# Altium PCB PCI Express_16765X6890_64PIN_Low profile_Clear.PCBDOC (part 1 of 9)
Units mm, origin at the board's own origin, x right, y up, seen from the top; angles counter-clockwise.
Board outline 80.71 x 137.84 mm, 6 copper layers (Top Layer, Layer 2 (GND), Layer 3, Layer 4, Layer 5 (AGND), Bottom Layer), stack 1.571 mm thick; 507 components, 297 nets, 1544 pads, 616 vias.
Unrouted connection lines stored in the file: 101.
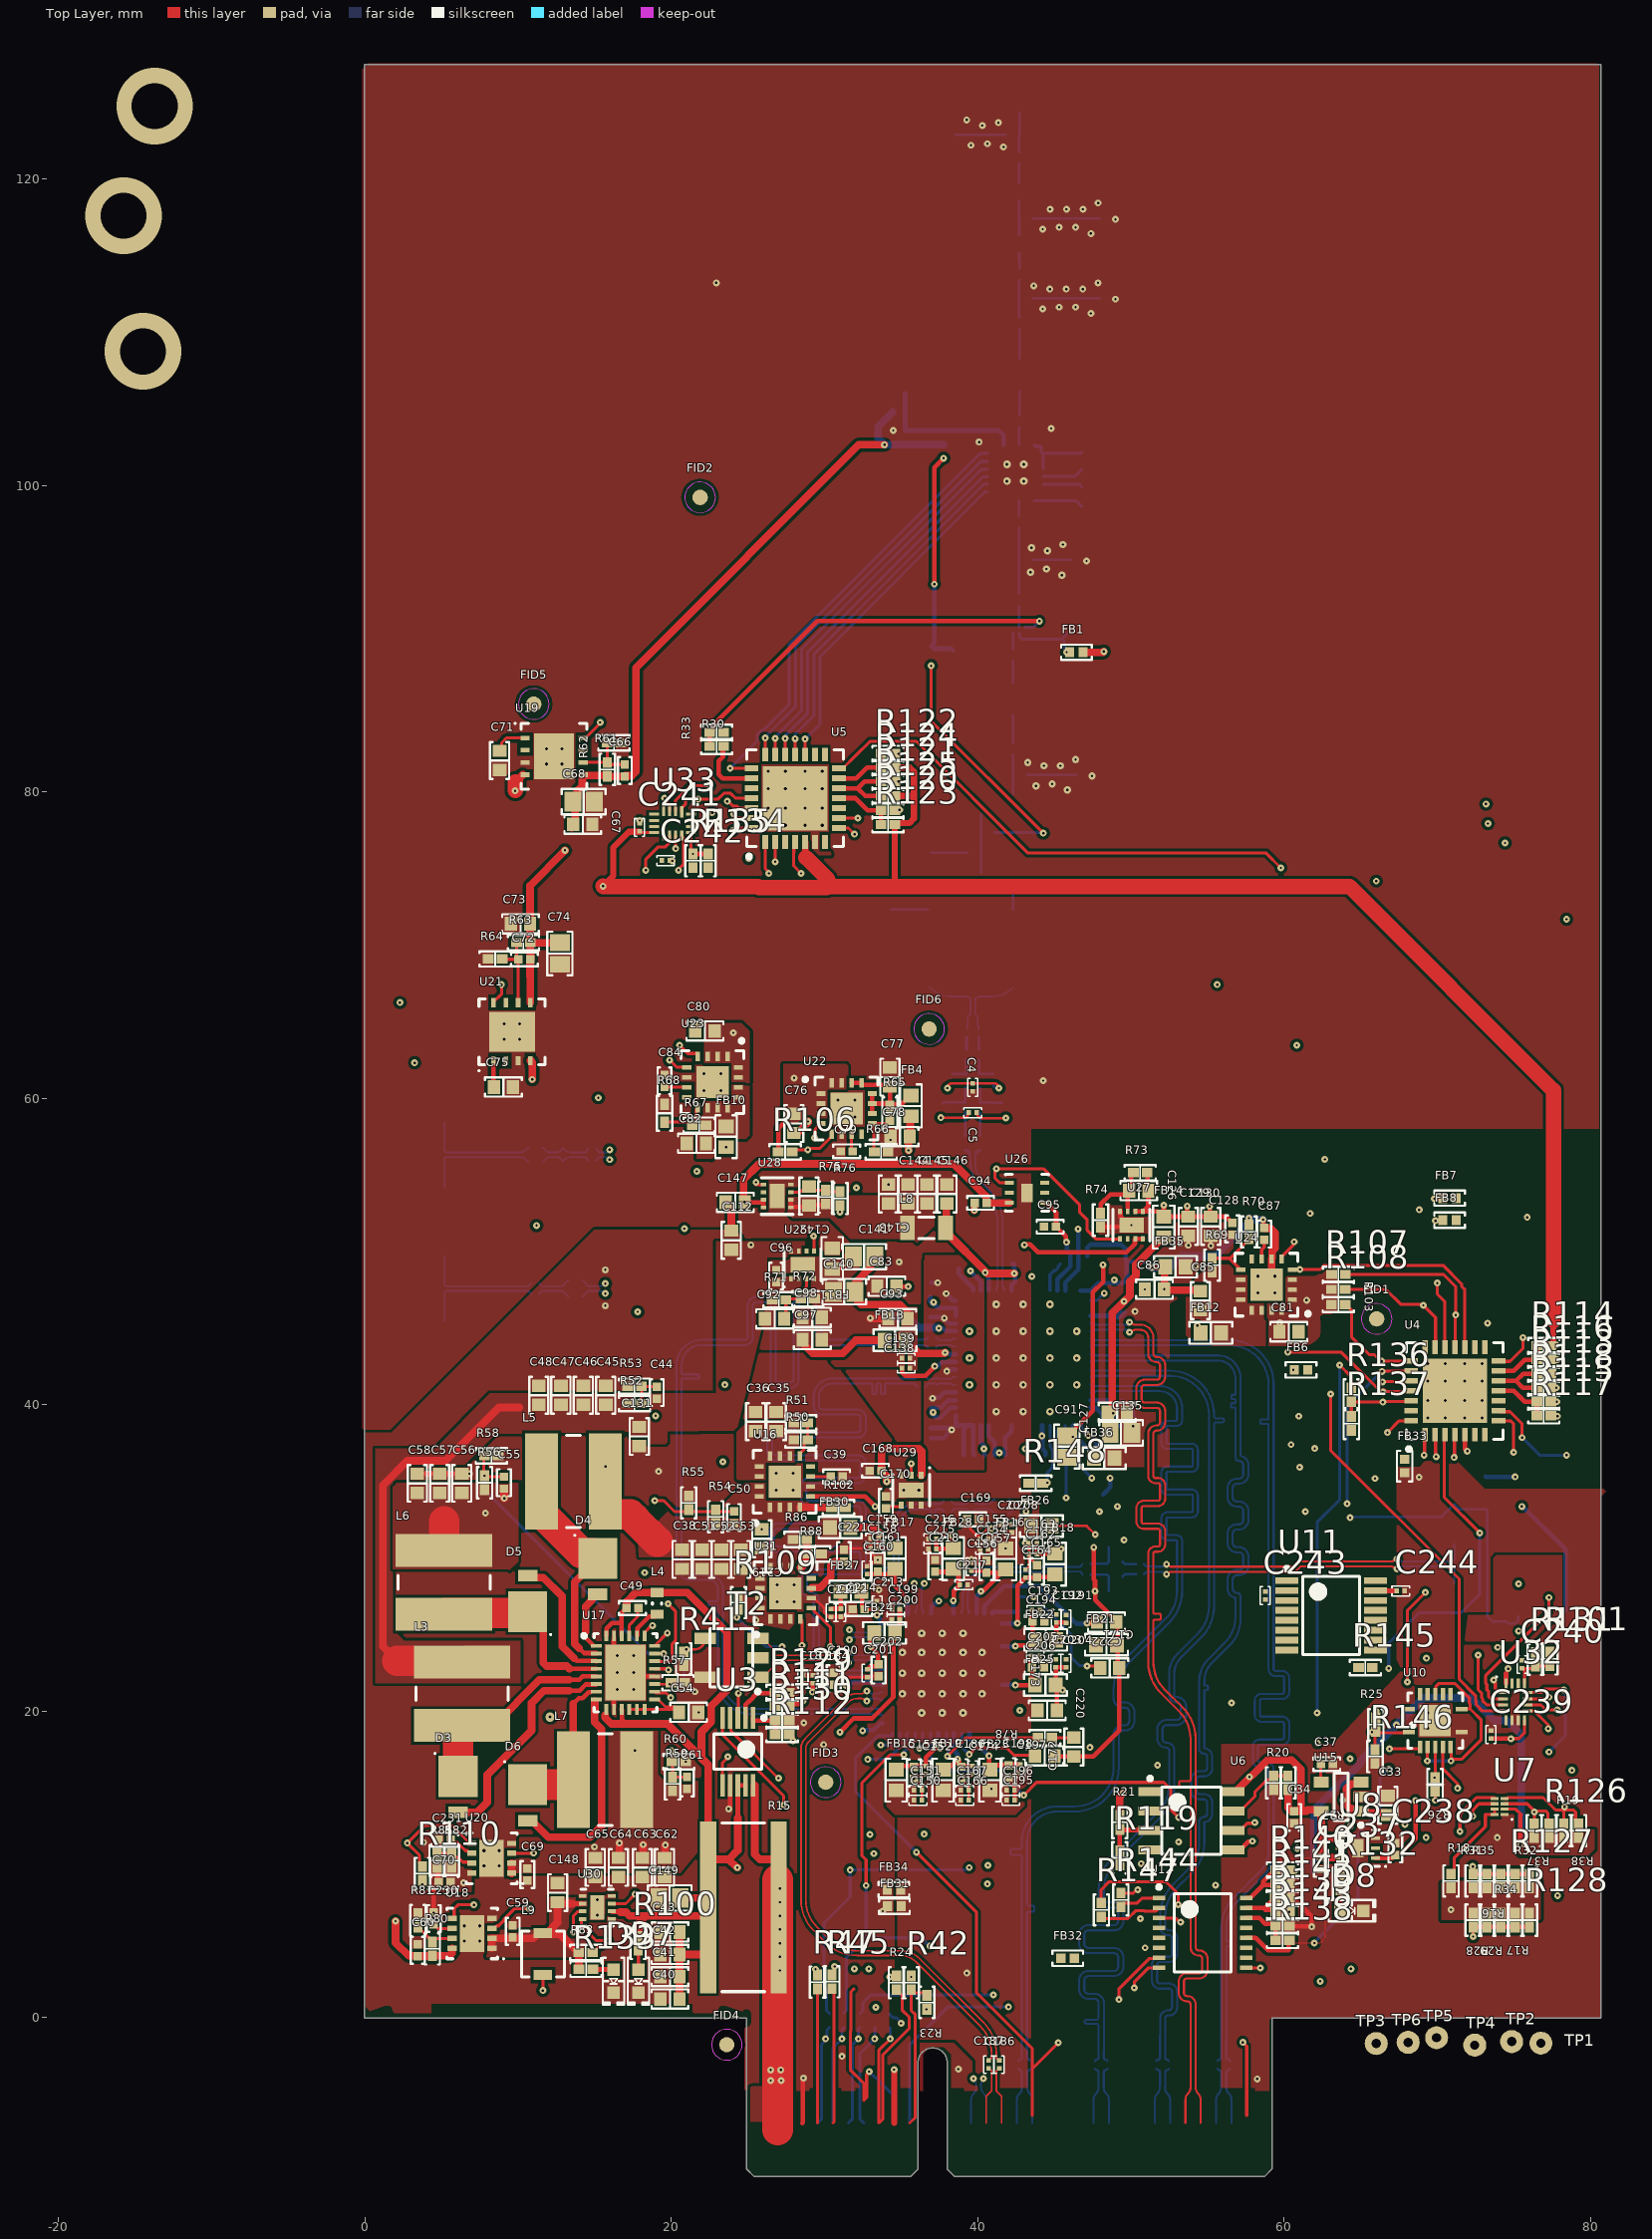
[diagram p0: Top Layer view]
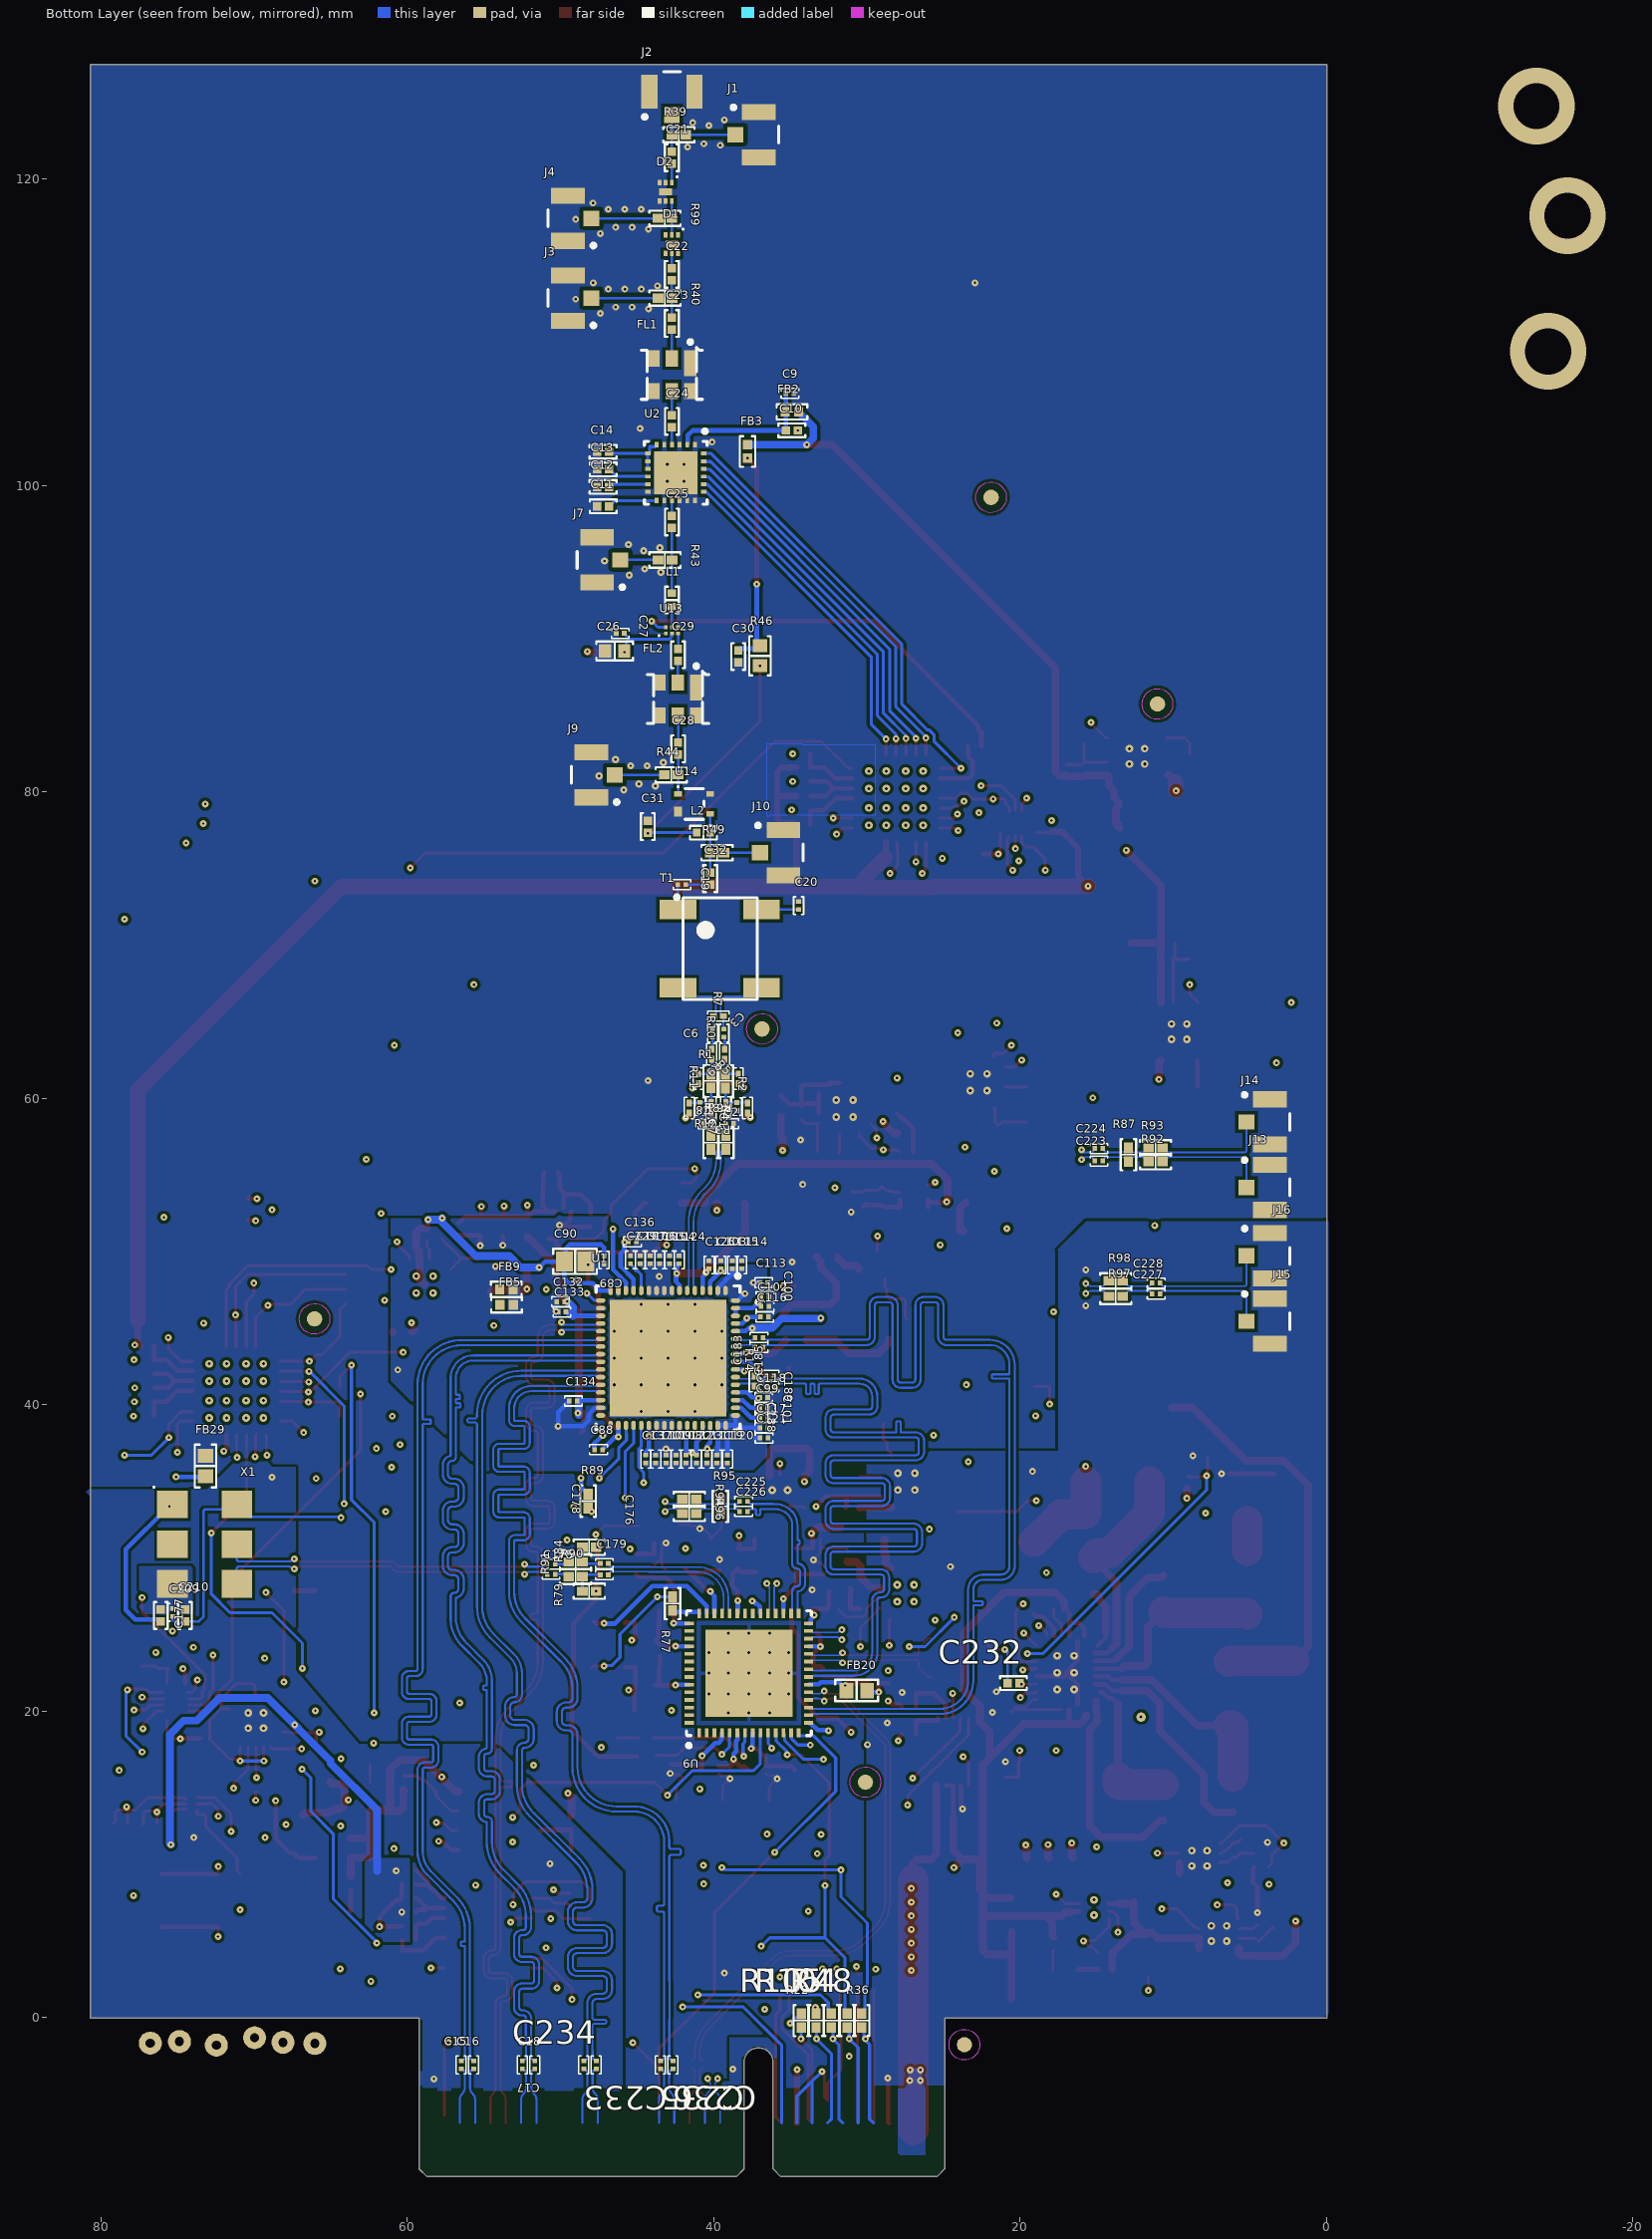
[diagram p1: Bottom Layer view, seen from below]
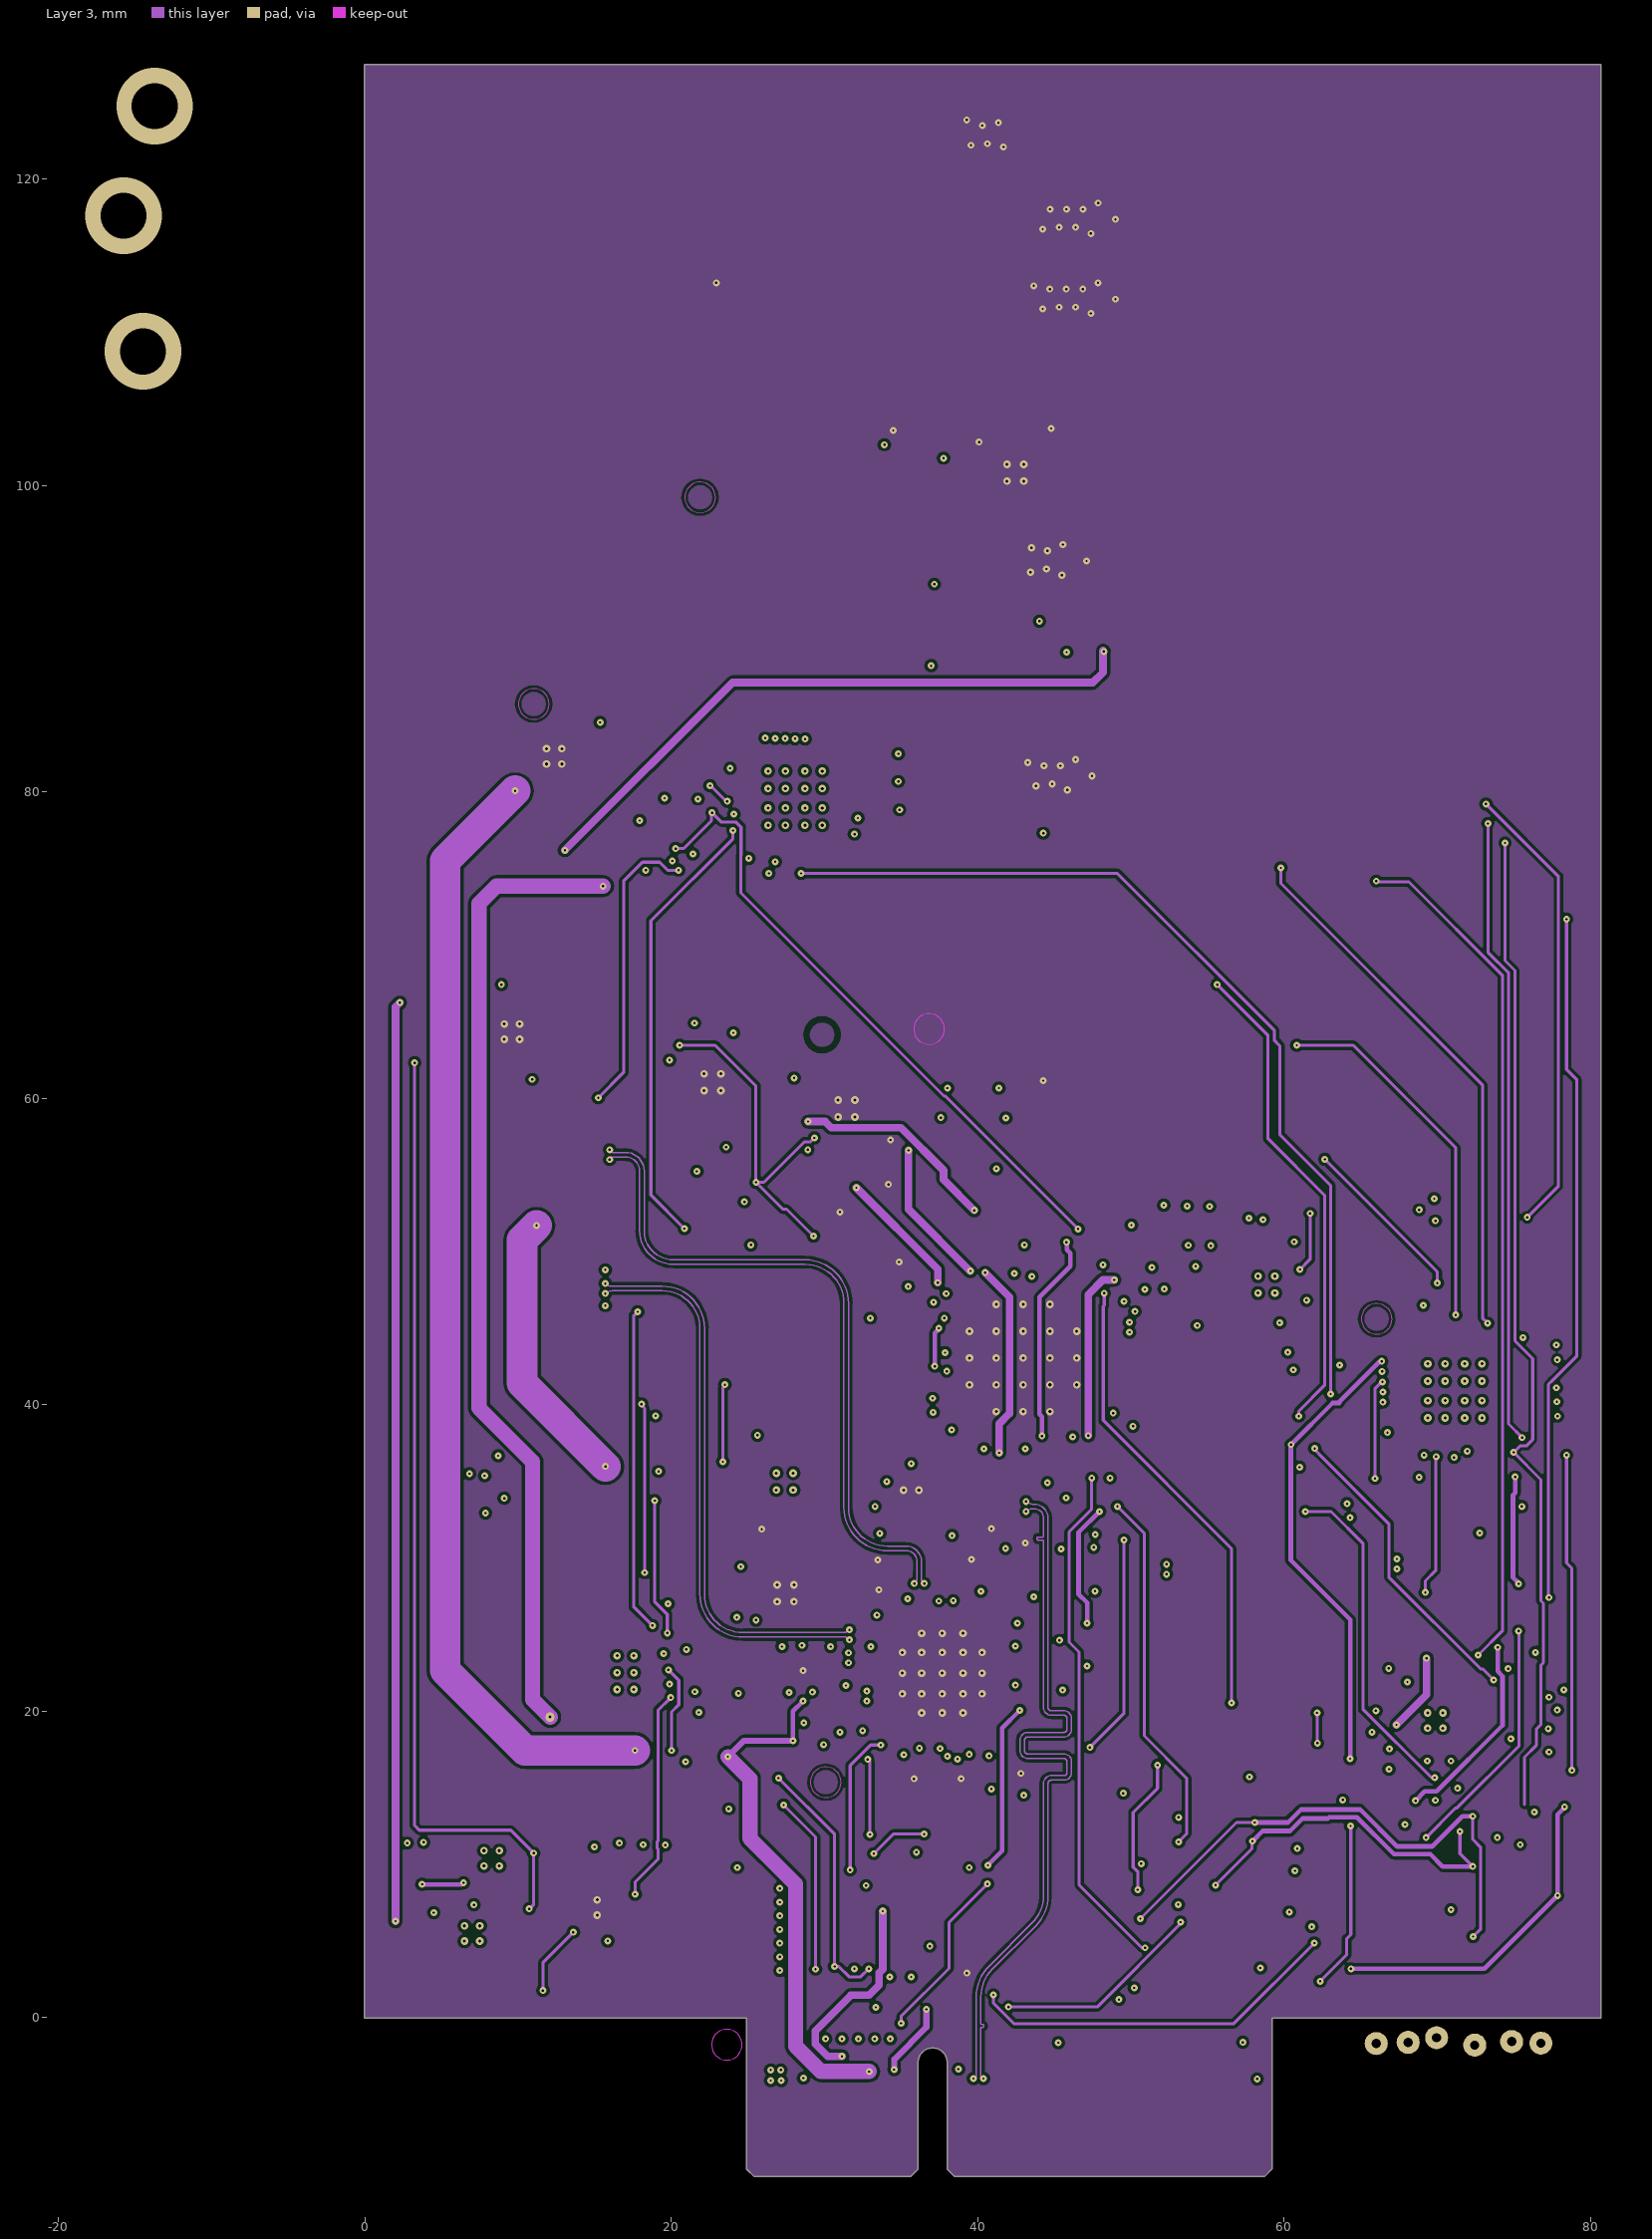
[diagram p2: Layer 3]
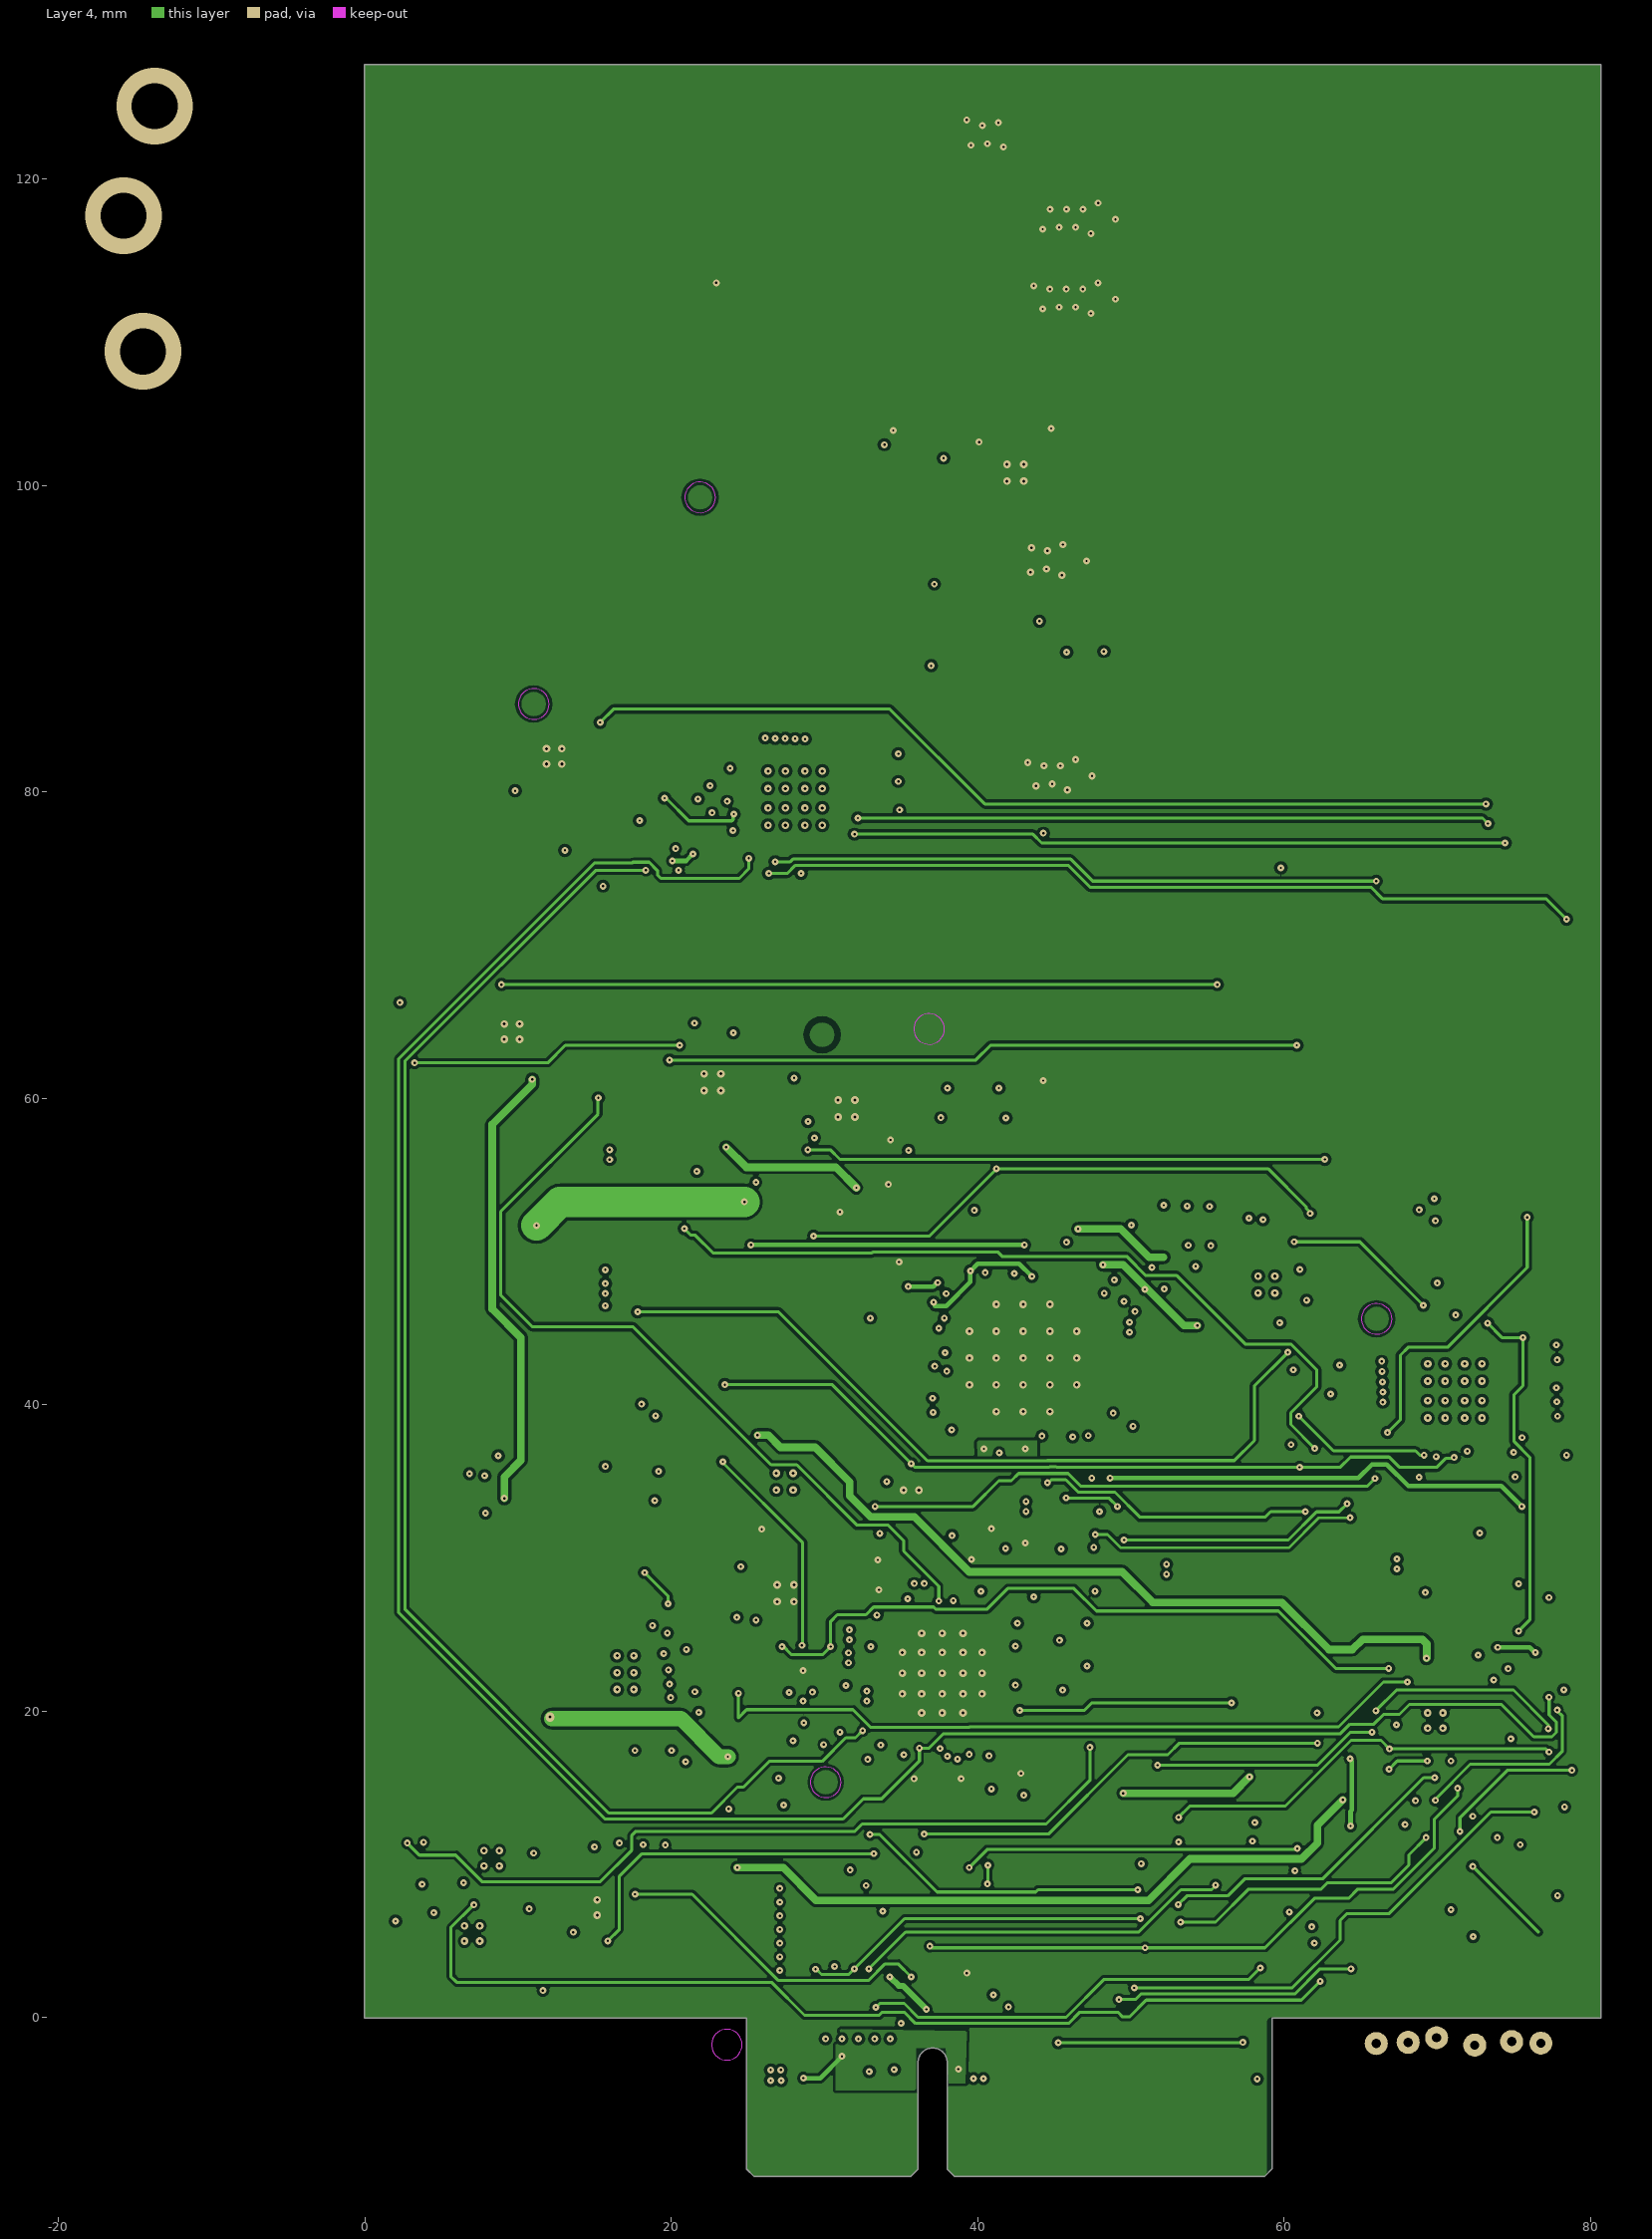
[diagram p3: Layer 4]

## Layer stack, top to bottom
Top Solder: solder mask 0.02, SM-001, Dk 4
Top Layer: signal copper 0.018
Dielectric 1: prepreg 0.105, PP-016, Dk 4.4
Layer 2 (GND): signal copper 0.035
Dielectric 3: core 0.5, Core-035, Dk 4.7
Layer 3: signal copper 0.035
Dielectric 5: prepreg 0.185, PP-021, Dk 4.7
Layer 4: signal copper 0.035
Dielectric 6: core 0.5, Core-035, Dk 4.7
Layer 5 (AGND): signal copper 0.035
Dielectric 7: prepreg 0.105, PP-016, Dk 4.4
Bottom Layer: signal copper 0.018
Bottom Solder: solder mask 0.02, SM-001, Dk 4

## Board outline
-0.039,-0.051 24.909,-0.051 24.909,-9.888 25.409,-10.388 35.609,-10.388 36.109,-9.888 36.109,-2.938 cw(c37.059,-2.938) 38.009,-2.938 38.009,-9.888 38.509,-10.388 58.709,-10.388 59.209,-9.888 59.209,-0.051 80.674,-0.051 80.674,127.457 -0.039,127.457

## Design rules (kind name [scope] priority, off if disabled: settings)
Clearance Diif100 [InNetClass('Diff100')] p1: gap=0.2 ignorepadtopadclearanceinfootprint=FALSE
Clearance 50Ohm [InNetClass('Single50Ohm')] p2: gap=0.2 ignorepadtopadclearanceinfootprint=FALSE
Clearance [All] p3: gap=0.2 ignorepadtopadclearanceinfootprint=FALSE
DiffPairsRouting [InDifferentialPairClass('All Differential Pairs')] p1: maxlimit=0.2 minlimit=0.127 mostfreqgap=0.2 toplayer_minwidth=0.112 toplayer_maxwidth=0.141 toplayer_prefwidth=0.141 midlayer1_mingap=0.127 midlayer1_minwidth=0.055 midlayer1_maxwidth=0.101 midlayer1_prefwidth=0.101 midlayer2_mingap=0.127 midlayer2_minwidth=0.055 midlayer2_maxwidth=0.101 midlayer2_prefwidth=0.101 midlayer3_maxgap=0.127 midlayer3_prefgap=0.127 midlayer3_minwidth=0.043 midlayer3_maxwidth=0.048 midlayer3_prefwidth=0.048 midlayer4_maxgap=0.127 midlayer4_prefgap=0.127 midlayer4_minwidth=0.043 midlayer4_maxwidth=0.048 midlayer4_prefwidth=0.048 bottomlayer_minwidth=0.112 bottomlayer_maxwidth=0.141 bottomlayer_prefwidth=0.141 impedanceprofiledriven=TRUE impedanceprofileid={1AC89F91-10E0-4EB5-B110-80BDDA22771A} impedanceprofilevalue=100.000000 maxuncoupledlength=20
Length Length_4 [InNetClass('Dlugosc4')] p1: maxlimit=68.6 minlimit=68
Length Length_3 [InNetClass('Dlugosc_sync')] p2: maxlimit=68 minlimit=67.5
Length Length_2 [InNetClass('Dlugosc_2')] p3: maxlimit=10.5 minlimit=10
Length Length_1 [InNetClass('Dlugosc_1')] p4: maxlimit=54.5 minlimit=54
Length [InNetClass('Dlugosc')] p5: maxlimit=66 minlimit=65.5
MatchedLengths MatchedLengths_1 [InNetClass('Dlugosc')] p1: tolerance=0.5 checknetsindiffpair=TRUE checkdiffpairvsdiffpair=FALSE checkxsignals=FALSE checkothers=FALSE
PlaneConnect [All] p1: planeconnectstyle=Direct reliefexpansion=0.508 reliefentries=4 reliefconductorwidth=0.254 reliefairgap=0.254
PolygonConnect [All] p1: connectstyle=Direct reliefconductorwidth=0.254 reliefentries=4 polygonreliefangle="90 Angle" airgapwidth=0.254
RoutingVias [All] p1: holewidth=0.2 width=0.6 viastyle="Through Hole" minholewidth=0.15 minwidth=0.4 maxholewidth=0.5 maxwidth=1
SolderMaskExpansion [All] p1: expansion=0.102 istentingtop=FALSE
Width 50_100 [InNetClass('Single50Ohm') or InNetClass('Diff100')] p1: maxlimit=0.181 minlimit=0.102 preferedwidth=0.181 toplayer_minwidth=0.165 toplayer_maxwidth=0.169 toplayer_prefwidth=0.169 midlayer1_minwidth=0.174 midlayer2_minwidth=0.174 midlayer3_maxwidth=0.107 midlayer3_prefwidth=0.107 midlayer4_maxwidth=0.107 midlayer4_prefwidth=0.107 bottomlayer_minwidth=0.165 bottomlayer_maxwidth=0.169 bottomlayer_prefwidth=0.169 impedanceprofiledriven=TRUE impedanceprofileid={0EED1AA9-C798-4E79-A537-DC2102893D86} impedanceprofilevalue=50.000000 minimp=50.000000 maximp=50.000000 favimp=50.000000
Width Power [InNetClass('Power_LINE')] p2: maxlimit=2 minlimit=0.3 preferedwidth=0.5
Width Inn [InNetClass('All Nets')] p3: maxlimit=0.4 minlimit=0.2 preferedwidth=0.3
28 further rules are at their usual default settings.

## Classes and differential pairs
net class Dlugosc4: CLKout1_N CLKout1_P CLKout2_P
net class Dlugosc_3: CLKout2_N CLKout3_N CLKout3_P
net class Dlugosc_sync: PET3_N PET3_P
net class Dlugosc_2: LMK_CLKin1_N LMK_CLKin1_P
net class Dlugosc_1: CLKin1_N CLKin1_P
net class Dlugosc: CMLout1_N CMLout1_P CMLout2_N CMLout2_P CMLout3_N CMLout3_P CMLout4_N CMLout4_P NetU1_20 NetU1_21
net class CLK_IN2: LMK_CLKin0_N LMK_CLKin0_P LMK_CLKin1_N LMK_CLKin1_P
differential pair class Diff100: ADC_CLK9690 AN_IN AN_IN_9690 CLKin0 CLKin0_1 CLKin1 CLKin1_1 CLKout1 CLKout2 CLKout3 CLKout4 CLKout5 CLKout9 LMK_CLKin0 LMK_CLKin1 O1 O2 O5 O5P OSCIN VCXO_OUT
differential pair class Diff100CtoConn: O2 PER0 PER1 PER2 PER3 PET1 PET2 PET3
differential pair class Diff100ADCtoC: CMLout1 CMLout2 CMLout3 CMLout4
net class Single50Ohm: AGND AN_IN_N AN_IN_P CLKin0_1_N CLKin0_1_P CLKin0_N CLKin0_P CLKin1_1_N CLKin1_1_P LMK_CLKin0_N LMK_CLKin0_P LMK_CLKin1_N LMK_CLKin1_P NetC1_1 NetC2_1 NetC3_2 NetC4_2 NetC5_1 NetC5_2 NetC6_2 NetC7_2 NetC8_2 NetC21_1 NetC21_2 NetC22_1 NetC22_2 NetC23_2 NetC24_1 NetC24_2 NetC25_1 NetC25_2 NetC28_1 NetC28_2 NetC29_1 NetC29_2 NetC32_2 NetC175_2 NetC176_1 NetC178_2 NetC179_1 NetC209_2 NetC232_1 NetC232_2 NetD1_2 NetJ1_2 NetJ3_2 NetJ4_2 NetJ7_2 NetJ9_2 NetJ10_2 NetL1_1 NetR1_2 NetR9_1 Tor_RF_50 TorRF_50 TorRF_50_1 VCXO_OUT_N VCXO_OUT_P
net class Power_LINE: 1.8V_SPI_ADC 5V 12V 4610_FINE_V 9690_AGND_SR +12V AGND AVDD1_1.25V AVDD1_SR_1.25V AVDD2_2.5V AVDD3_3.3V CLK_GND CTRL_VCXO DGND DRGND DRVDD_1.25V DVDD_1.25V GND GND_VCXO NetC66_2 NetC72_2 NetC77_2 NetC82_2 NetC85_2 NetC92_2 NetC126_2 NetC142_2 NetC177_2 NetC209_2 NetC219_2 NetD3_1 NetD3_2 NetD4_1 NetD4_2 NetD5_1 NetD5_2 NetD6_1 NetD6_2 "NetU1_44, 43, 32" V2.5 V3.6 V5.5 V_LMK_1.8V VCC VCC_5_ATT VCC_AMP_5 VCC_PCA VDD_CORE VDD_IO VDD_OSC VDD_PLL1 VDD_PLL2CORE VDD_PLL2OSC VDDO_1/2 VDDO_3/4 VDDO_5 VDDO_6 VDDO_7/8 VDDO_9/10 VP3.6 Vsup_ADC1 Vsup_ADC2
net class JTAG[1..5]: JTAG1 JTAG2 JTAG3 JTAG4 JTAG5
net class Diff100: ADC_CLK9690_N ADC_CLK9690_P AGND AN_IN_9690_N AN_IN_9690_P AN_IN_N AN_IN_P CLKin0_N CLKin0_P CLKin1_N CLKin1_P CLKout1_N CLKout1_P CLKout2_N CLKout2_P CLKout3_N CLKout3_P CLKout4_N CLKout4_P CLKout5_N CLKout5_P LMK_CLKin0_N LMK_CLKin0_P LMK_CLKin1_N LMK_CLKin1_P LMK_CLKsel NetC209_2 O1_N O1_P O2_N O2_P O5_N O5_P O5P_N O5P_P OSCIN_N OSCIN_P VCXO_OUT_N VCXO_OUT_P
net class CtoConn: O2_N O2_P PER0_N PER0_P PER1_N PER1_P PER2_N PER2_P PER3_N PER3_P PET1_N PET1_P PET2_N PET2_P PET3_N PET3_P
net class CLKDisToC: CLKout1_N CLKout1_P CLKout2_N CLKout2_P CLKout3_N CLKout3_P CLKout5_N CLKout5_P
net class CLK_Out: CLKout1_N CLKout1_P CLKout2_N CLKout2_P CLKout3_N CLKout3_P CLKout5_N CLKout5_P
net class CLK_O: ADC_CLK9690_N ADC_CLK9690_P O1_N O1_P O2_N O2_P O5_N O5_P
net class CLK_IN1: CLKin0_N CLKin0_P CLKin1_N CLKin1_P
net class Ain: AN_IN_9690_N AN_IN_9690_P
net class ADC_CLK: ADC_CLK9690_N ADC_CLK9690_P O1_N O1_P O2_N O2_P O5_N O5_P
component class U_Zegar: C171 C172 C173 C175 C176 C177 C178 C179 C183 C185 C186 C187 C188 C189 C222 C223 C224 C225 C226 C227 C228 C232 FB21 J13 J14 J15 J16 R41 R77 R78 R79 R84 R87 R89 R90 R91 R92 R93 R94 R95 R96 R97 R98 T2 X1
component class U_Zasilanie: C33 C34 C35 C36 C37 C38 C39 C40 C41 C42 C43 C44 C45 C46 C47 C48 C49 C50 C51 C52 C53 C54 C55 C56 C57 C58 C59 C60 C61 C62 C63 C64 C65 C66 C67 C68 C69 C70 C71 C72 C73 C74 C75 C148 C149 C230 C231 C237 C238 D3 D4 D5 D6 D7 D8 D9 FB31 FB32 FB33 FB34 L3 L4 L5 L6 L7 L9 R50 R51 R52 R53 R54 R55 R56 R57 R58 R59 R60 R61 R62 R63 R64 R80 R81 R82 R83 R85 R100 R102 R103 R110 R132 R133 U8 U15 U16 U17 U18 U19 U20 U21 U30
component class U_Zasilanie_LMK: C150 C151 C152 C153 C154 C155 C156 C157 C158 C159 C160 C161 C162 C163 C164 C165 C166 C167 C168 C169 C170 C174 C180 C181 C182 C184 C190 C191 C192 C193 C194 C195 C196 C197 C198 C199 C200 C201 C202 C203 C204 C205 C206 C207 C208 C209 C210 C211 C212 C213 C214 C215 C216 C217 C218 C219 C220 C221 FB15 FB16 FB17 FB18 FB19 FB20 FB22 FB23 FB24 FB25 FB26 FB27 FB28 FB29 FB30 R86 R88 R109 U9 U29 U31
component class U_Zasilanie_ADC: C76 C77 C78 C79 C80 C81 C82 C83 C84 C85 C86 C87 C88 C89 C90 C91 C92 C93 C94 C95 C96 C97 C98 C99 C100 C101 C102 C103 C104 C105 C106 C107 C108 C109 C110 C111 C112 C113 C114 C115 C116 C117 C118 C119 C120 C121 C122 C123 C124 C125 C126 C127 C128 C129 C130 C131 C132 C133 C134 C135 C136 C137 C138 C139 C140 C141 C142 C143 C144 C145 C146 C147 C229 FB4 FB5 FB6 FB7 FB8 FB9 FB10 FB11 FB12 FB13 FB14 FB35 FB36 L8 R65 R66 R67 R68 R69 R70 R71 R72 R73 R74 R75 R76 R106 R107 R108 U1 U22 U23 U24 U25 U26 U27 U28
component class U_Tor: C19 C20 FB1 FB2 FB3 T1
component class U_TorGnss: C23 C24 C25 C26 C27 C28 C29 C30 C31 C32 FL1 FL2 J7 J9 J10 L1 L2 R43 R44 R46 R49 U13 U14
component class "U_Tor antenowy": C21 C22 D1 D2 J1 J2 J3 J4 R39 R40 R99
component class "U_Pomiar prądu i napięcia": R15 R111 R112 R129 R130 U3
component class U_Komunikacja: C15 C16 C17 C18 C233 C234 C235 C236 C243 C244 R16 R17 R18 R19 R22 R23 R24 R25 R26 R28 R29 R31 R32 R34 R35 R36 R37 R38 R42 R45 R47 R48 R104 R105 R126 R127 R128 R138 R139 R140 R141 R142 R143 R144 R145 R146 R147 R148 TP1 TP2 TP3 TP4 TP5 TP6 U7 U10 U11 U12
component class U_Flash: R20 R21 R27 R119 U6
component class U_Expander: C239 C240 C241 C242 R30 R33 R101 R113 R114 R115 R116 R117 R118 R120 R121 R122 R123 R124 R125 R131 R134 R135 R136 R137 U4 U5 U32 U33
component class U_ATT: C9 C10 C11 C12 C13 C14 U2
component class U_ADC: C1 C2 C3 C4 C5 C6 C7 C8 R1 R2 R3 R4 R5 R6 R7 R8 R9 R10 R11 R12 R13 R14
component class Karta_Radiowa: FID1 FID2 FID3 FID4 FID5 FID6
differential pair PET2: +PET2_P -PET2_N
differential pair PET1: +PET1_P -PET1_N
differential pair CMLout4: +CMLout4_P -CMLout4_N
differential pair CMLout3: +CMLout3_P -CMLout3_N
differential pair OSCIN: +OSCIN_P -OSCIN_N
differential pair CLKout4: +CLKout4_P -CLKout4_N
differential pair CLKin0: +CLKin0_P -CLKin0_N
differential pair CLKin1_1: +CLKin1_1_P -CLKin1_1_N
differential pair CLKin0_1: +CLKin0_1_P -CLKin0_1_N
differential pair VCXO_OUT: +VCXO_OUT_P -VCXO_OUT_N
differential pair PET3: +PET3_P -PET3_N
differential pair PER3: +PER3_P -PER3_N
differential pair PER2: +PER2_P -PER2_N
differential pair PER1: +PER1_P -PER1_N
differential pair PER0: +PER0_P -PER0_N
differential pair O5: +O5_P -O5_N
differential pair O5P: +O5P_P -O5P_N
differential pair O2: +O2_P -O2_N
differential pair O1: +O1_P -O1_N
differential pair LMK_CLKin1: +LMK_CLKin1_P -LMK_CLKin1_N
differential pair LMK_CLKin0: +LMK_CLKin0_P -LMK_CLKin0_N
differential pair CMLout2: +CMLout2_P -CMLout2_N
differential pair CMLout1: +CMLout1_P -CMLout1_N
differential pair CLKout5: +CLKout5_P -CLKout5_N
differential pair CLKout3: +CLKout3_P -CLKout3_N
differential pair CLKout2: +CLKout2_P -CLKout2_N
differential pair CLKout1: +CLKout1_P -CLKout1_N
differential pair CLKin1: +CLKin1_P -CLKin1_N
differential pair AN_IN: +AN_IN_P -AN_IN_N
differential pair AN_IN_9690: +AN_IN_9690_P -AN_IN_9690_N
differential pair ADC_CLK9690: +ADC_CLK9690_P -ADC_CLK9690_N

## Components (designator, comment, footprint, x,y, rotation, side; value= is the part's Value field where it differs from the comment)
C1 "4pF" "CAP 0201/0603 RF" 38.481,59.455 r270 bottom
C2 "1pF" "CAP 0201/0603 RF" 38.938,58.344 r180 bottom
C3 "100nF" "CAP 0201/0603 RF" 39.319,64.243 r270 bottom
C4 "100nF" "CAP 0201/0603 RF" 39.675,60.706 r90 top
C5 "1pF" "CAP 0201/0603 RF" 39.675,59.055 r180 top
C6 "100nF" "CAP 0201/0603 RF" 40.056,64.243 r270 bottom
C7 "4pF" "CAP 0201/0603 RF" 40.869,59.461 r90 bottom
C8 "1pF" "CAP 0201/0603 RF" 40.411,58.344 r180 bottom
C9 "100nF" "CAP 0201/0603 RF" 35.005,106.006 r0 bottom
C10 "10uF" "CAP 0402/1005 RF" 34.877,103.581 r0 bottom
C11 "330pF" "CAP 0402/1005 RF" 47.196,98.628 r0 bottom
C12 "330pF" "CAP 0402/1005 RF" 47.205,99.898 r0 bottom
C13 "330pF" "CAP 0402/1005 RF" 47.196,101.041 r0 bottom
C14 "330pF" "CAP 0402/1005 RF" 47.205,102.184 r0 bottom
C15 "100nF" "CAP 0201/0603 RF" 56.464,-3.093 r270 bottom
C16 "100nF" "CAP 0201/0603 RF" 55.651,-3.093 r270 bottom
C17 "100nF" "CAP 0201/0603 RF" 52.476,-3.099 r270 bottom
C18 "100nF" "CAP 0201/0603 RF" 51.664,-3.099 r270 bottom
C19 "100nF" "CAP 0201/0603 RF" 42.057,73.941 r0 bottom
C20 "100nF" "CAP 0201/0603 RF" 34.442,72.568 r270 bottom
C21 "22pF" "CAP 0402/1005 RF" 42.716,121.386 r270 bottom
C22 "22pF" "CAP 0402/1005 RF" 42.717,113.763 r270 bottom
C23 "33pF" "CAP 0402/1005 RF" 42.717,110.566 r270 bottom
C24 "33pF" "CAP 0402/1005 RF" 42.709,104.169 r270 bottom
C25 "33pF" "CAP 0402/1005 RF" 42.709,97.603 r270 bottom
C26 "2.2uF" "CAP 0603/1608 RF" 46.446,89.19 r180 bottom
C27 "100nF" "CAP 0201/0603 RF" 46.087,90.331 r180 bottom
C28 "33pF" "CAP 0402/1005 RF" 42.309,82.802 r90 bottom
C29 "33pF" "CAP 0402/1005 RF" 42.317,88.942 r90 bottom
C30 "33pF" "CAP 0402/1005 RF" 38.382,88.824 r90 bottom
C31 "33pF" "CAP 0402/1005 RF" 44.284,77.725 r270 bottom
C32 "33pF" "CAP 0402/1005 RF" 40.217,74.331 r90 bottom
C33 "1uF" "CAP 0603/1608 RF" 66.777,13.843 r270 top
C34 "2.2uF" "CAP 0402/1005 RF" 60.655,13.056 r90 top
C35 "4.7uF" "CAP 0603/1608 RF" 26.848,38.887 r270 top
C36 "4.7uF" "CAP 0603/1608 RF" 25.502,38.887 r270 top
C37 "100pF" "CAP 0402/1005 RF" 62.788,16.539 r180 top
C38 "4.7uF" "CAP 0603/1608 RF" 20.707,29.897 r90 top
C39 "1nF" "CAP 0402/1005 RF" 30.785,35.306 r180 top
C40 "4.7uF" "CAP 0603/1608 RF" 19.914,1.201 r180 top
C41 "4.7uF" "CAP 0603/1608 RF" 19.914,2.658 r180 top
C42 "4.7uF" "CAP 0603/1608 RF" 19.914,4.111 r180 top
C43 "4.7uF" "CAP 0603/1608 RF" 19.914,5.573 r180 top
C44 "22pF" "CAP 0402/1005 RF" 19.05,40.783 r270 top
C45 "4.7uF" "CAP 0603/1608 RF" 15.721,40.606 r270 top
C46 "4.7uF" "CAP 0603/1608 RF" 14.256,40.606 r270 top
C47 "4.7uF" "CAP 0603/1608 RF" 12.79,40.606 r270 top
C48 "4.7uF" "CAP 0603/1608 RF" 11.352,40.606 r270 top
C49 "1uF" "CAP 0402/1005 RF" 17.462,26.72 r180 top
C50 "22pF" "CAP 0402/1005 RF" 24.091,32.631 r270 top
C51 "4.7uF" "CAP 0603/1608 RF" 22.022,29.896 r90 top
C52 "4.7uF" "CAP 0603/1608 RF" 23.266,29.896 r90 top
C53 "4.7uF" "CAP 0603/1608 RF" 24.536,29.896 r90 top
C54 "100nF" "CAP 0603/1608 RF" 21.133,19.914 r180 top
C55 "22pF" "CAP 0402/1005 RF" 9.075,34.902 r270 top
C56 "4.7uF" "CAP 0603/1608 RF" 6.323,34.861 r270 top
C57 "4.7uF" "CAP 0603/1608 RF" 4.883,34.861 r270 top
C58 "4.7uF" "CAP 0603/1608 RF" 3.422,34.861 r270 top
C59 "4.7uF" "CAP 0402/1005 RF" 9.65,5.618 r270 top
C60 "4.7uF" "CAP 0402/1005 RF" 3.44,4.386 r270 top
C61 "22pF" "CAP 0402/1005 RF" 21.024,15.3 r270 top
C62 "4.7uF" "CAP 0603/1608 RF" 19.554,9.789 r90 top
C63 "4.7uF" "CAP 0603/1608 RF" 18.114,9.789 r90 top
C64 "4.7uF" "CAP 0603/1608 RF" 16.551,9.789 r90 top
C65 "4.7uF" "CAP 0603/1608 RF" 15.035,9.789 r90 top
C66 "680pF" "CAP 0402/1005 RF" 16.963,81.384 r270 top
C67 "1uF" "CAP 0603/1608 RF" 14.224,77.876 r180 top
C68 "10uF" "CAP 0805/2012 RF" 14.275,79.35 r180 top
C69 "4.7uF" "CAP 0402/1005 RF" 10.605,9.32 r90 top
C70 "4.7uF" "CAP 0402/1005 RF" 5.213,8.851 r0 top
C71 "10nF" "CAP 0603/1608 RF" 8.788,82.042 r90 top
C72 "1.5nF" "CAP 0402/1005 RF" 10.421,69.06 r0 top
C73 "4.7uF" "CAP 0603/1608 RF" 10.161,71.384 r0 top
C74 "10uF" "CAP 0805/2012 RF" 12.725,69.439 r90 top
C75 "10nF" "CAP 0603/1608 RF" 9.042,60.731 r180 top
C76 "4.7uF" "CAP 0603/1608 RF" 28.003,58.349 r90 top
C77 "4.7uF" "CAP 0603/1608 RF" 34.27,61.374 r270 top
C78 "4.7uF" "CAP 0603/1608 RF" 34.937,57.499 r0 top
C79 "1nF" "CAP 0402/1005 RF" 31.454,56.527 r0 top
C80 "4.7uF" "CAP 0603/1608 RF" 22.196,64.383 r0 top
C81 "4.7uF" "CAP 0603/1608 RF" 60.31,44.755 r180 top
C82 "4.7uF" "CAP 0603/1608 RF" 21.64,57.055 r0 top
C83 "4.7uF" "CAP 0603/1608 RF" 34.071,47.727 r0 top
C84 "1nF" "CAP 0402/1005 RF" 19.558,61.138 r270 top
C85 "4.7uF" "CAP 0603/1608 RF" 54.534,46.787 r270 top
C86 "4.7uF" "CAP 0603/1608 RF" 51.537,47.523 r180 top
C87 "1nF" "CAP 0402/1005 RF" 58.699,51.13 r270 top
C88 "100nF" "CAP 0201/0603 RF" 47.498,37.059 r180 bottom
C89 "100nF" "CAP 0201/0603 RF" 47.142,49.434 r270 bottom
C90 "10uF" "CAP 0805/2012 RF" 49.036,49.352 r180 bottom
C91 "10uF" "CAP 0805/2012 RF" 45.822,37.262 r90 top
C92 "2.2nF" "CAP 0603/1608 RF" 26.746,45.593 r180 top
C93 "4.7uF" "CAP 0603/1608 RF" 34.788,45.618 r0 top
C94 "470nF" "CAP 0402/1005 RF" 40.183,53.169 r0 top
C95 "470nF" "CAP 0402/1005 RF" 44.729,51.613 r0 top
C96 "1uF" "CAP 0402/1005 RF" 26.841,48.387 r270 top
C97 "10uF" "CAP 0603/1608 RF" 29.199,44.239 r180 top
C98 "4.7uF" "CAP 0603/1608 RF" 29.199,45.695 r180 top
C99 "100nF" "CAP 0201/0603 RF" 36.722,39.776 r0 bottom
C100 "100nF" "CAP 0201/0603 RF" 36.633,47.041 r0 bottom
C101 "100nF" "CAP 0201/0603 RF" 36.697,39.141 r0 bottom
C102 "100nF" "CAP 0201/0603 RF" 36.633,46.406 r0 bottom
C103 "100nF" "CAP 0201/0603 RF" 39.523,49.116 r270 bottom
C104 "100nF" "CAP 0201/0603 RF" 42.875,49.446 r270 bottom
C105 "100nF" "CAP 0201/0603 RF" 43.51,49.446 r270 bottom
C106 "100nF" "CAP 0201/0603 RF" 44.145,49.446 r270 bottom
C107 "100nF" "CAP 0201/0603 RF" 44.78,49.446 r270 bottom
C108 "100nF" "CAP 0201/0603 RF" 42.443,36.443 r90 bottom
C109 "100nF" "CAP 0201/0603 RF" 43.104,36.443 r90 bottom
C110 "100nF" "CAP 0201/0603 RF" 43.764,36.443 r90 bottom
C111 "100nF" "CAP 0201/0603 RF" 40.437,36.443 r90 bottom
C112 "4.7uF" "CAP 0603/1608 RF" 23.919,50.724 r270 top
C113 "100nF" "CAP 0201/0603 RF" 36.722,47.955 r0 bottom
C114 "100nF" "CAP 0201/0603 RF" 38.162,49.116 r270 bottom
C115 "100nF" "CAP 0201/0603 RF" 38.761,49.116 r270 bottom
C116 "100nF" "CAP 0201/0603 RF" 36.658,45.72 r0 bottom
C117 "100nF" "CAP 0201/0603 RF" 36.703,38.481 r0 bottom
C118 "100nF" "CAP 0201/0603 RF" 36.722,40.462 r0 bottom
C119 "100nF" "CAP 0201/0603 RF" 39.776,36.443 r90 bottom
C120 "100nF" "CAP 0201/0603 RF" 39.091,36.443 r90 bottom
C121 "100nF" "CAP 0201/0603 RF" 36.697,37.821 r0 bottom
C122 "100nF" "CAP 0201/0603 RF" 41.783,36.443 r90 bottom
C123 "100nF" "CAP 0201/0603 RF" 41.123,36.443 r90 bottom
C124 "100nF" "CAP 0201/0603 RF" 42.24,49.446 r270 bottom
C125 "100nF" "CAP 0201/0603 RF" 40.285,49.116 r270 bottom
C126 "2.2nF" "CAP 0603/1608 RF" 50.515,53.959 r0 top
C127 "4.7uF" "CAP 0603/1608 RF" 49.108,39.497 r180 top
C128 "1uF" "CAP 0402/1005 RF" 56.617,51.469 r90 top
C129 "10uF" "CAP 0603/1608 RF" 53.749,51.637 r90 top
C130 "4.7uF" "CAP 0603/1608 RF" 55.213,51.637 r90 top
C131 "4.7uF" "CAP 0603/1608 RF" 17.907,37.922 r90 top
C132 "100nF" "CAP 0201/0603 RF" 49.981,46.711 r180 bottom
C133 "100nF" "CAP 0201/0603 RF" 49.886,46.05 r180 bottom
C134 "100nF" "CAP 0201/0603 RF" 49.149,40.234 r180 bottom
C135 "10uF" "CAP 0805/2012 RF" 49.352,38.151 r180 top
C136 "100nF" "CAP 0201/0603 RF" 45.288,50.622 r0 bottom
C137 "100nF" "CAP 0201/0603 RF" 44.425,36.443 r90 bottom
C138 "100nF" "CAP 0201/0603 RF" 35.325,42.393 r0 top
C139 "100nF" "CAP 0201/0603 RF" 35.325,43.028 r0 top
C140 "10uF" "CAP 0805/2012 RF" 31.293,47.371 r0 top
C141 "10uF" "CAP 0805/2012 RF" 32.588,49.657 r0 top
C142 "2.2nF" "CAP 0603/1608 RF" 28.988,53.615 r270 top
C143 "4.7uF" "CAP 0603/1608 RF" 34.176,53.746 r270 top
C144 "10uF" "CAP 0603/1608 RF" 35.451,53.746 r270 top
C145 "10uF" "CAP 0603/1608 RF" 36.683,53.746 r270 top
C146 "10uF" "CAP 0603/1608 RF" 37.989,53.746 r270 top
C147 "4.7uF" "CAP 0603/1608 RF" 24.178,53.199 r0 top
C148 "22uF" "CAP 0603/1608 RF" 12.573,8.143 r270 top
C149 "10uF" "CAP 0805/2012 RF" 19.888,7.798 r0 top
C150 "100nF" "CAP 0201/0603 RF" 36.102,14.178 r180 top
C151 "100nF" "CAP 0201/0603 RF" 36.102,14.828 r180 top
C152 "100nF" "CAP 0201/0603 RF" 36.602,16.166 r90 top
C153 "10uF" "CAP 0402/1005 RF" 35.842,15.966 r90 top
C154 "100nF" "CAP 0201/0603 RF" 40.431,30.562 r0 top
C155 "100nF" "CAP 0201/0603 RF" 40.431,31.237 r0 top
C156 "100nF" "CAP 0201/0603 RF" 39.585,29.428 r270 top
C157 "10uF" "CAP 0402/1005 RF" 40.569,29.428 r270 top
C158 "100nF" "CAP 0201/0603 RF" 33.276,30.622 r0 top
C159 "100nF" "CAP 0201/0603 RF" 33.276,31.259 r0 top
C160 "100nF" "CAP 0201/0603 RF" 32.782,29.204 r270 top
C161 "10uF" "CAP 0402/1005 RF" 33.475,29.472 r270 top
C162 "100nF" "CAP 0201/0603 RF" 43.614,30.262 r0 top
C163 "100nF" "CAP 0201/0603 RF" 43.614,30.937 r0 top
C164 "100nF" "CAP 0201/0603 RF" 43.121,28.968 r270 top
C165 "10uF" "CAP 0402/1005 RF" 43.874,29.122 r270 top
C166 "100nF" "CAP 0201/0603 RF" 39.151,14.178 r180 top
C167 "100nF" "CAP 0201/0603 RF" 39.15,14.828 r180 top
C168 "10uF" "CAP 0402/1005 RF" 33.325,35.687 r0 top
C169 "10uF" "CAP 0402/1005 RF" 39.7,32.512 r0 top
C170 "1uF" "CAP 0402/1005 RF" 34.011,33.63 r270 top
C171 "10uF" "CAP 0603/1608 RF" 48.616,22.809 r0 top
C172 "10uF" "CAP 0603/1608 RF" 46.279,17.653 r270 top
C173 "10uF" "CAP 0603/1608 RF" 44.374,17.069 r0 top
C174 "100nF" "CAP 0201/0603 RF" 39.666,16.166 r90 top
C175 "100nF" "CAP 0201/0603 RF" 50.598,28.927 r180 bottom
C176 "100nF" "CAP 0201/0603 RF" 47.128,28.887 r180 bottom
C177 "100pF" "CAP 0402/1005 RF" 76.073,26.229 r270 bottom
C178 "100nF" "CAP 0201/0603 RF" 50.598,29.589 r180 bottom
C179 "100nF" "CAP 0201/0603 RF" 47.128,29.624 r180 bottom
C180 "10uF" "CAP 0402/1005 RF" 38.919,15.977 r90 top
C181 "100nF" "CAP 0201/0603 RF" 28.6,22.073 r270 top
C182 "100nF" "CAP 0201/0603 RF" 29.261,22.073 r270 top
C183 "100nF" "CAP 0201/0603 RF" 37.027,43.739 r0 bottom
C184 "100nF" "CAP 0201/0603 RF" 29.87,22.067 r270 top
C185 "100nF" "CAP 0201/0603 RF" 37.027,44.374 r0 bottom
C186 "100nF" "CAP 0201/0603 RF" 40.716,-3.073 r270 top
C187 "100nF" "CAP 0201/0603 RF" 41.402,-3.073 r270 top
C188 "100nF" "CAP 0201/0603 RF" 36.316,41.148 r0 bottom
C189 "100nF" "CAP 0201/0603 RF" 36.316,41.91 r0 bottom
C190 "10uF" "CAP 0402/1005 RF" 30.607,22.107 r270 top
C191 "100nF" "CAP 0201/0603 RF" 45.771,26.016 r270 top
C192 "100nF" "CAP 0201/0603 RF" 45.136,26.035 r270 top
C193 "100nF" "CAP 0201/0603 RF" 43.796,26.568 r180 top
C194 "10uF" "CAP 0402/1005 RF" 43.967,25.832 r180 top
C195 "100nF" "CAP 0201/0603 RF" 42.154,14.178 r180 top
C196 "100nF" "CAP 0201/0603 RF" 42.154,14.828 r180 top
C197 "100nF" "CAP 0201/0603 RF" 42.774,16.25 r90 top
C198 "10uF" "CAP 0402/1005 RF" 42.012,16.044 r90 top
C199 "100nF" "CAP 0201/0603 RF" 34.652,26.645 r0 top
C200 "100nF" "CAP 0201/0603 RF" 34.652,25.959 r0 top
C201 "100nF" "CAP 0201/0603 RF" 32.791,22.473 r90 top
C202 "10uF" "CAP 0402/1005 RF" 33.528,22.666 r90 top
C203 "100nF" "CAP 0201/0603 RF" 45.093,23.114 r270 top
C204 "100nF" "CAP 0201/0603 RF" 45.768,23.114 r270 top
C205 "100nF" "CAP 0201/0603 RF" 43.756,23.589 r180 top
C206 "10uF" "CAP 0402/1005 RF" 43.943,22.856 r180 top
C207 "100nF" "CAP 0201/0603 RF" 41.554,31.908 r270 top
C208 "100nF" "CAP 0201/0603 RF" 42.215,31.908 r270 top
C209 "100nF" "CAP 0201/0603 RF" 75.286,26.435 r270 bottom
C210 "10uF" "CAP 0402/1005 RF" 74.498,26.238 r270 bottom
C211 "100nF" "CAP 0201/0603 RF" 30.429,26.41 r90 top
C212 "100nF" "CAP 0201/0603 RF" 31.064,26.416 r90 top
C213 "100nF" "CAP 0201/0603 RF" 33.426,26.918 r270 top
C214 "10uF" "CAP 0402/1005 RF" 32.233,26.645 r0 top
C215 "100nF" "CAP 0201/0603 RF" 37.05,30.583 r0 top
C216 "100nF" "CAP 0201/0603 RF" 37.05,31.23 r0 top
C217 "100nF" "CAP 0201/0603 RF" 39.097,28.245 r180 top
C218 "10uF" "CAP 0402/1005 RF" 37.225,29.472 r270 top
C219 "4.7uF" "CAP 0603/1608 RF" 25.908,31.242 r270 top
C220 "4.7uF" "CAP 0603/1608 RF" 44.536,20.041 r0 top
C221 "1nF" "CAP 0402/1005 RF" 31.267,30.15 r90 top
C222 "4.7uF" "CAP 0603/1608 RF" 48.409,25.808 r0 top
C223 "100nF" "CAP 0201/0603 RF" 14.84,55.905 r0 bottom
C224 "100nF" "CAP 0201/0603 RF" 14.84,56.718 r0 bottom
C225 "100nF" "CAP 0201/0603 RF" 38.03,33.68 r180 bottom
C226 "100nF" "CAP 0201/0603 RF" 38.03,33.02 r180 bottom
C227 "100nF" "CAP 0201/0603 RF" 11.106,47.219 r180 bottom
C228 "100nF" "CAP 0201/0603 RF" 11.106,47.93 r180 bottom
C229 "100nF" "CAP 0201/0603 RF" 45.415,49.446 r270 bottom
C230 "10pF" "CAP 0402/1005 RF" 4.494,6.453 r270 top
C231 "10pF" "CAP 0402/1005 RF" 5.213,11.604 r0 top
C232 "1nF" "CAP 0402/1005 RF" 20.422,21.819 r180 bottom
C233 "100nF" "CAP 0201/0603 RF" 48.463,-3.099 r270 bottom
C234 "100nF" "CAP 0201/0603 RF" 47.65,-3.099 r270 bottom
C235 "100nF" "CAP 0201/0603 RF" 43.459,-3.099 r270 bottom
C236 "100nF" "CAP 0201/0603 RF" 42.647,-3.099 r270 bottom
C237 "470nF" "CAP 0402/1005 RF" 62.408,10.058 r90 top
C238 "470nF" "CAP 0402/1005 RF" 67.259,10.998 r270 top
C239 "100nF" "CAP 0201/0603 RF" 73.508,18.466 r270 top
C240 "100nF" "CAP 0201/0603 RF" 75.54,23.038 r90 top
C241 "100nF" "CAP 0201/0603 RF" 17.932,77.673 r270 top
C242 "100nF" "CAP 0201/0603 RF" 19.634,75.514 r180 top
C243 "100nF" "CAP 0201/0603 RF" 58.776,27.534 r270 top
C244 "100nF" "CAP 0201/0603 RF" 67.615,27.838 r0 top
D1 "MADL-011021-14150T" MADP-011029-14150 42.716,115.738 r270 bottom
D2 "MADP-011029-14150T" MADP-011029-14150 43.116,119.151 r270 bottom
D3 "MBRM140T3" "CASE 457" 6.083,14.08 r270 top
D4 "MBRM140T3" "CASE 457" 15.201,28.319 r270 top
D5 "MBRM140T3" "CASE 457" 10.629,28.144 r90 top
D6 "MBRM140T3" "CASE 457" 10.629,13.536 r270 top
D7 "LTST-C190GKT" "LED 0603/1608 GREEN" 17.856,2.362 r270 top
D8 "LTST-C190GKT" "LED 0603/1608 GREEN" 64.428,6.96 r0 top
D9 "LTST-C190GKT" "LED 0603/1608 GREEN" 16.231,2.362 r270 top
FB1 "120R" "FER 0402/1005" 46.443,89.103 r180 top
FB2 "120R" "FER 0402/1005" 34.877,104.796 r0 bottom
FB3 "120R" "FER 0402/1005" 37.775,102.209 r270 bottom
FB4 "120R" "FER 0603/1608" 35.637,59.49 r270 top
FB5 "10R" "FER 0402/1005" 53.501,46.507 r0 bottom
FB6 "10R" "FER 0402/1005" 61.104,42.266 r0 top
FB7 "10R" "FER 0402/1005" 70.798,53.478 r0 top
FB8 "10R" "FER 0402/1005" 70.798,52.041 r0 top
FB9 "10R" "FER 0402/1005" 53.518,47.523 r0 bottom
FB10 "120R" "FER 0603/1608" 23.581,57.478 r270 top
FB11 "120R" "FER 0603/1608" 30.505,49.53 r90 top
FB12 "120R" "FER 0603/1608" 55.22,44.679 r180 top
FB13 "120R" "FER 0603/1608" 34.609,44.196 r0 top
FB14 "120R" "FER 0603/1608" 52.146,51.587 r270 top
FB15 "220R" "FER 0603/1608" 34.681,15.491 r90 top
FB16 "220R" "FER 0603/1608" 41.823,29.928 r270 top
FB17 "220R" "FER 0603/1608" 34.607,29.947 r270 top
FB18 "220R" "FER 0603/1608" 45.046,29.587 r270 top
FB19 "220R" "FER 0603/1608" 37.748,15.491 r90 top
FB20 "220R" "FER 0603/1608" 30.647,21.336 r0 bottom
FB21 "120R" "FER 0603/1608" 48.409,24.328 r0 top
FB22 "220R" "FER 0603/1608" 44.439,24.638 r180 top
FB23 "220R" "FER 0603/1608" 40.8,15.492 r90 top
FB24 "220R" "FER 0603/1608" 33.924,25.095 r180 top
FB25 "220R" "FER 0603/1608" 44.418,21.698 r180 top
FB26 "220R" "FER 0603/1608" 44.156,32.08 r0 top
FB27 "220R" "FER 0603/1608" 31.725,27.813 r0 top
FB28 "220R" "FER 0603/1608" 38.4,29.947 r270 top
FB29 "120R" "FER 0603/1608" 73.152,35.992 r90 bottom
FB30 "120R" "FER 0603/1608" 31.024,31.979 r0 top
FB31 "10R" "FER 0402/1005" 34.562,7.254 r0 top
FB32 "10R" "FER 0402/1005" 45.872,3.861 r180 top
FB33 "10R" "FER 0402/1005" 67.869,35.984 r90 top
FB34 "10R" "FER 0402/1005" 34.531,8.343 r0 top
FB35 "120R" "FER 0603/1608" 52.908,48.997 r180 top
FB36 "120R" "FER 0603/1608" 48.26,36.5 r180 top
FID1 "Fiducials" FIDUCIALS 66.04,45.593 r90 top
FID2 "Fiducials" FIDUCIALS 21.881,99.212 r90 top
FID3 "Fiducials" FIDUCIALS 30.081,15.354 r90 top
FID4 "Fiducials" FIDUCIALS 23.622,-1.778 r90 top
FID5 "Fiducials" FIDUCIALS 11.019,85.725 r90 top
FID6 "Fiducials" FIDUCIALS 36.83,64.516 r90 top
FL1 "TA1703A (1570)" TAI-SAW_3X3P6 42.717,107.21 r270 bottom
FL2 "TA1703A (1570)" TAI-SAW_3X3P6 42.317,86.055 r270 bottom
J1 "1909763-1" TECO-1909763-1_V 37.045,122.885 r270 bottom
J2 "1909763-1" TECO-1909763-1_V 42.708,125.691 r180 bottom
J3 "1909763-1" TECO-1909763-1_V 49.491,112.217 r90 bottom
J4 "1909763-1" TECO-1909763-1_V 49.491,117.424 r90 bottom
J7 "1909763-1" TECO-1909763-1_V 47.599,95.126 r90 bottom
J9 "1909763-1" TECO-1909763-1_V 47.967,81.102 r90 bottom
J10 "1909763-1" TECO-1909763-1_V 35.44,76.022 r270 bottom
J13 "1909763-1" TECO-1909763-1_V 3.682,54.178 r270 bottom
J14 "1909763-1" TECO-1909763-1_V 3.682,58.445 r270 bottom
J15 "1909763-1" TECO-1909763-1_V 3.682,45.441 r270 bottom
J16 "1909763-1" TECO-1909763-1_V 3.682,49.708 r270 bottom
L1 "8.2nH" "IND 0402/1005 RF WW" 42.709,92.515 r90 bottom
L2 "8.2nH" "IND 0402/1005 RF WW" 40.657,77.335 r0 bottom
L3 "CDRH5D28-4R2" CDRH5D28 6.345,21.13 r90 top
L4 "15uH" FB0603 19.067,27.025 r270 top
L5 "CDRH5D28-8R2" CDRH5D28 13.605,34.987 r0 top
L6 "CDRH5D28-8R2" CDRH5D28 5.168,28.397 r90 top
L7 "CDRH5D28-8R2" CDRH5D28 15.68,15.519 r0 top
L8 "1uH" RC1206 36.653,51.545 r0 top
L9 "VLF3012ST-2R2M1R4" VLF3012ST-2R2M1R4 11.619,4.14 r90 top
R1 "10R" "RES 0201/0603" 39.268,62.865 r270 bottom
R2 "0mR" "RES 0402/1005 RF" 39.218,61.112 r270 bottom
R3 "10R" "RES 0201/0603" 39.192,59.39 r270 bottom
R4 "0mR" "RES 0402/1005 RF" 39.192,57.106 r270 bottom
R5 "49.9R" "RES 0201/0603" 38.379,61.265 r90 bottom
R6 "10R" "RES 0201/0603" 37.77,59.355 r90 bottom
R7 "49.9R" "RES 0201/0603" 39.68,65.354 r180 bottom
R8 "10R" "RES 0201/0603" 41.58,59.36 r270 bottom
R9 "49.9R" "RES 0201/0603" 40.996,61.265 r270 bottom
R10 "10R" "RES 0201/0603" 40.107,62.865 r270 bottom
R11 "0mR" "RES 0402/1005 RF" 40.157,61.12 r270 bottom
R12 "10R" "RES 0201/0603" 40.157,59.385 r270 bottom
R13 "0mR" "RES 0402/1005 RF" 40.157,57.099 r270 bottom
R14 "100R" "RES 0201/0603" 37.338,41.529 r90 bottom
R15 "FCSL110R005FER" FCSL110R005FERCT-ND 24.706,7.182 r180 top
R16 "200kR" "RES 0402/1005 RF" 70.891,8.915 r270 top
R17 "1kR" "RES 0402/1005 RF" 75.082,6.35 r270 top
R18 "1kR" "RES 0402/1005 RF" 74.168,8.915 r90 top
R19 "1kR" "RES 0402/1005 RF" 78.257,12.192 r270 top
R20 "0mR" "RES 0402/1005 RF" 59.309,15.316 r90 top
R21 "10kR" "RES 0402/1005 RF" 49.276,12.725 r90 top
R22 "0mR" "RES 0402/1005 RF" 34.265,-0.21 r90 bottom
R23 "10kR" "RES 0402/1005 RF" 36.678,0.983 r270 top
R24 "10kR" "RES 0402/1005 RF" 34.696,2.261 r90 top
R25 "0mR" "RES 0402/1005 RF" 65.989,19.101 r90 top
R26 "0mR" "RES 0402/1005 RF" 69.85,15.207 r270 top
R27 "10kR" "RES 0402/1005 RF" 60.249,15.316 r270 top
R28 "1kR" "RES 0402/1005 RF" 72.339,6.35 r270 top
R29 "1kR" "RES 0402/1005 RF" 73.254,6.35 r270 top
R30 "4.7kR" "RES 0402/1005 RF" 22.962,82.956 r0 top
R31 "1kR" "RES 0402/1005 RF" 72.339,8.915 r90 top
R32 "1kR" "RES 0402/1005 RF" 76.022,8.915 r90 top
R33 "14.7kR" "RES 0402/1005 RF" 22.962,83.871 r180 top
R34 "1kR" "RES 0402/1005 RF" 74.168,6.35 r270 top
R35 "1kR" "RES 0402/1005 RF" 73.254,8.915 r90 top
R36 "0mR" "RES 0402/1005 RF" 30.328,-0.203 r90 bottom
R37 "1kR" "RES 0402/1005 RF" 76.327,12.192 r270 top
R38 "1kR" "RES 0402/1005 RF" 79.223,12.192 r270 top
R39 "0mR" "RES 0402/1005 RF" 42.259,122.885 r0 bottom
R40 "0mR" "RES 0402/1005 RF" 43.159,112.217 r180 bottom
R41 "51R" "RES 0402/1005 RF" 20.812,23.414 r90 top
R42 "0mR" "RES 0402/1005 RF" 35.662,2.261 r90 top
R43 "0mR" "RES 0402/1005 RF" 43.159,95.126 r180 bottom
R44 "0mR" "RES 0402/1005 RF" 42.759,81.102 r180 bottom
R45 "0mR" "RES 0402/1005 RF" 30.48,2.322 r90 top
R46 "15R" "RES 0603/1608" 36.965,88.874 r90 bottom
R47 "0mR" "RES 0402/1005 RF" 29.54,2.315 r90 top
R48 "0mR" "RES 0402/1005 RF" 31.267,-0.203 r90 bottom
R49 "0mR" "RES 0402/1005 RF" 39.767,76.022 r0 bottom
R50 "100kR" "RES 0402/1005 RF" 28.455,37.694 r180 top
R51 "24.9kR" "RES 0402/1005 RF" 28.448,38.811 r0 top
R52 "21.5kR" "RES 0402/1005 RF" 17.605,40.071 r180 top
R53 "10kR" "RES 0402/1005 RF" 17.602,41.199 r0 top
R54 "35.7kR" "RES 0402/1005 RF" 22.897,32.682 r270 top
R55 "10.2kR" "RES 0402/1005 RF" 21.133,33.597 r90 top
R56 "35.7kR" "RES 0402/1005 RF" 7.814,34.902 r270 top
R57 "18.2kR" "RES 0402/1005 RF" 20.429,21.844 r180 top
R58 "10.2kR" "RES 0402/1005 RF" 8.255,36.652 r0 top
R59 "61.9kR" "RES 0402/1005 RF" 20.084,15.24 r90 top
R60 "10.5kR" "RES 0402/1005 RF" 20.491,16.688 r0 top
R61 "4.02kR" "RES 0402/1005 RF" 15.82,81.461 r270 top
R62 "1kR" "RES 0402/1005 RF" 16.259,83.193 r180 top
R63 "1.8kR" "RES 0402/1005 RF" 10.355,70.154 r0 top
R64 "1kR" "RES 0402/1005 RF" 8.507,69.089 r0 top
R65 "100kR" "RES 0402/1005 RF" 34.27,59.04 r90 top
R66 "24.9kR" "RES 0402/1005 RF" 33.695,56.499 r180 top
R67 "1.5kR" "RES 0402/1005 RF" 21.815,58.235 r0 top
R68 "1kR" "RES 0402/1005" 19.562,59.013 r270 top
R69 "1.5kR" "RES 0402/1005 RF" 55.296,49.098 r270 top
R70 "1kR" "RES 0402/1005 RF" 57.709,51.275 r270 top
R71 "4.99kR" "RES 0402/1005 RF" 27.033,46.838 r180 top
R72 "3.32kR" "RES 0402/1005 RF" 28.899,46.914 r180 top
R73 "4.99kR" "RES 0402/1005 RF" 50.61,55.14 r0 top
R74 "3.32kR" "RES 0402/1005 RF" 48.017,52.037 r90 top
R75 "56kR" "RES 0402/1005 RF" 30.081,53.544 r270 top
R76 "10kR" "RES 0402/1005 RF" 31.014,53.444 r90 top
R77 "0mR" "RES 0402/1005 RF" 42.672,27.007 r270 bottom
R78 "0mR" "RES 0402/1005 RF" 44.392,18.263 r180 top
R79 "51R" "RES 0402/1005 RF" 48.106,27.82 r180 bottom
R80 "75kR" "RES 0402/1005 RF" 4.4,4.47 r270 top
R81 "10.7kR" "RES 0402/1005 RF" 3.459,6.327 r270 top
R82 "75kR" "RES 0402/1005 RF" 5.658,10.25 r270 top
R83 "100kR" "RES 0402/1005 RF" 14.408,4.242 r180 top
R84 "51R" "RES 0402/1005 RF" 48.106,30.69 r0 bottom
R85 "10.7kR" "RES 0402/1005 RF" 4.713,10.25 r90 top
R86 "100kR" "RES 0402/1005 RF" 28.397,31.191 r180 top
R87 "100R" "RES 0402/1005 RF" 12.921,56.31 r90 bottom
R88 "38.3kR" "RES 0402/1005 RF" 29.362,30.251 r180 top
R89 "0mR" "RES 0402/1005 RF" 48.184,33.699 r90 bottom
R90 "0mR" "RES 0402/1005 RF" 49.004,28.778 r180 bottom
R91 "0mR" "RES 0402/1005 RF" 49.004,29.739 r180 bottom
R92 "0mR" "RES 0402/1005 RF" 11.143,55.855 r0 bottom
R93 "0mR" "RES 0402/1005 RF" 11.143,56.76 r0 bottom
R94 "0mR" "RES 0402/1005 RF" 41.573,33.807 r180 bottom
R95 "100R" "RES 0402/1005 RF" 39.548,33.35 r270 bottom
R96 "0mR" "RES 0402/1005 RF" 41.573,32.893 r180 bottom
R97 "0mR" "RES 0402/1005 RF" 13.734,47.066 r180 bottom
R98 "0mR" "RES 0402/1005 RF" 13.734,48.082 r180 bottom
R99 "0mR" "RES 0402/1005 RF" 43.167,117.424 r180 bottom
R100 "1kR" "RES 0402/1005 RF" 17.831,4.826 r90 top
R101 "0mR" "RES 0402/1005 RF" 77.343,23.393 r90 top
R102 "100kR" "RES 0402/1005 RF" 30.912,33.274 r180 top
R103 "100kR" "RES 0402/1005 RF" 63.533,46.533 r0 top
R104 "0mR" "RES 0402/1005 RF" 32.309,-0.203 r90 bottom
R105 "0mR" "RES 0402/1005 RF" 33.299,-0.203 r90 bottom
R106 "100kR" "RES 0402/1005 RF" 27.432,56.49 r180 top
R107 "100kR" "RES 0402/1005 RF" 63.551,48.489 r180 top
R108 "100kR" "RES 0402/1005 RF" 63.533,47.523 r180 top
R109 "100kR" "RES 0402/1005 RF" 24.384,27.076 r90 top
R110 "100kR" "RES 0402/1005 RF" 3.759,9.398 r90 top
R111 "0mR" "RES 0402/1005 RF" 27.236,20.295 r180 top
R112 "0mR" "RES 0402/1005 RF" 27.236,18.466 r180 top
R113 "1kR" "RES 0402/1005 RF" 76.955,42.012 r0 top
R114 "1kR" "RES 0402/1005 RF" 76.955,43.84 r0 top
R115 "1kR" "RES 0402/1005 RF" 76.955,40.183 r0 top
R116 "0mR" "RES 0402/1005 RF" 76.955,42.926 r180 top
R117 "0mR" "RES 0402/1005 RF" 76.955,39.268 r180 top
R118 "0mR" "RES 0402/1005 RF" 76.955,41.097 r180 top
R119 "0mR" "RES 0402/1005 RF" 49.276,10.414 r90 top
R120 "0mR" "RES 0402/1005 RF" 34.138,78.791 r180 top
R121 "0mR" "RES 0402/1005 RF" 34.138,80.67 r180 top
R122 "0mR" "RES 0402/1005 RF" 34.138,82.499 r180 top
R123 "1kR" "RES 0402/1005 RF" 34.138,77.851 r0 top
R124 "1kR" "RES 0402/1005 RF" 34.138,81.585 r0 top
R125 "1kR" "RES 0402/1005 RF" 34.138,79.731 r0 top
R126 "1kR" "RES 0402/1005 RF" 77.292,12.192 r270 top
R127 "1kR" "RES 0402/1005 RF" 75.082,8.915 r270 top
R128 "1kR" "RES 0402/1005 RF" 76.022,6.35 r90 top
R129 "0mR" "RES 0402/1005 RF" 27.236,21.209 r0 top
R130 "0mR" "RES 0402/1005 RF" 27.236,19.38 r0 top
R131 "0mR" "RES 0402/1005 RF" 76.403,23.375 r270 top
R132 "120R" "RES 0402/1005 RF" 63.678,8.763 r90 top
R133 "300R" "RES 0402/1005 RF" 14.427,3.15 r180 top
R134 "0mR" "RES 0402/1005 RF" 22.403,75.489 r90 top
R135 "0mR" "RES 0402/1005 RF" 21.412,75.489 r270 top
R136 "1kR" "RES 0402/1005 RF" 64.389,40.64 r90 top
R137 "1.96kR" "RES 0402/1005 RF" 64.389,38.768 r90 top
R138 "1kR" "RES 0402/1005 RF" 59.893,5.029 r0 top
R139 "1kR" "RES 0402/1005 RF" 59.893,6.883 r0 top
R140 "1kR" "RES 0402/1005 RF" 59.893,9.627 r0 top
R141 "0mR" "RES 0402/1005 RF" 59.893,8.712 r180 top
R142 "0mR" "RES 0402/1005 RF" 59.886,7.798 r180 top
R143 "0mR" "RES 0402/1005 RF" 59.893,5.969 r180 top
R144 "1kR" "RES 0402/1005 RF" 49.341,7.669 r270 top
R145 "1kR" "RES 0402/1005 RF" 65.303,22.835 r180 top
R146 "2.55kR" "RES 0402/1005 RF" 65.938,17.025 r90 top
R147 "1kR" "RES 0402/1005 RF" 48.067,7.018 r270 top
R148 "2.55kR" "RES 0402/1005 RF" 43.79,34.874 r0 top
T1 "MABA-007681-CT2010" MABA-007681-CT2010 39.592,69.762 r180 bottom
T2 "MABAES0060" MABAES0060 23.932,23.473 r180 top
TP1 "TP" "Test Point" 76.759,-1.676 r0 top
TP2 "TP" "Test Point" 74.854,-1.575 r90 top
TP3 "TP" "Test Point" 66.015,-1.702 r90 top
TP4 "TP" "Test Point" 72.445,-1.803 r90 top
TP5 "TP" "Test Point" 69.952,-1.321 r90 top
TP6 "TP" "Test Point" 68.097,-1.626 r90 top
U1 "AD9690" AD9690 42.963,43.042 r270 bottom locked
U2 "HMC472ALP4E" HMC472ALP4E 42.459,100.824 r270 bottom
U3 "INA226AIDGSR" INA226 24.345,17.348 r270 top
U4 "MCP23017T-E/ML" MCP23017/MCP23S17 71.145,40.894 r90 top
U5 "MCP23017T-E/ML" MCP23017/MCP23S17 28.084,79.578 r90 top
U6 "AT24CM02-SSHM-T" AT24CM02 53.952,12.839 r0 top
U7 "PCA9306DQER" PCA9306 74.062,13.77 r180 top
U8 "LP5900SD-1.8/NOPB" LP5900 64.821,11.049 r180 top
U9 "LMK04610RTQR" LMK04610 37.687,22.472 r90 bottom
U10 "SN74LV4T125RGYR" SN74LV4T125RGYR 69.875,19.379 r0 top
U11 "SN74AXC4T774PWR" SN74AXC4T774PWR 63.068,26.238 r0 top
U12 "SC18IS602BIPW/S8HP" SC18IS602B 54.686,5.512 r0 top
U13 "BGA524N6" TSNP-6-10-FP 42.709,90.529 r90 bottom
U14 "BGA616" GPS05605 41.259,79.197 r180 bottom
U15 "AP2210K-3.3TRG1" AP2210K-3.3TRG1 63.724,14.404 r180 top
U16 "ADP1741ACPZ-R7" ADP1752_1753/ADP1740_1741 27.408,34.971 r90 top
U17 "LT3504EUFD#PBF" LT3504 17.01,22.505 r0 top
U18 "MCP1727T-ADJE/MF" MCP1727T-ADJE/MF 7.001,5.479 r180 top
U19 "LP3878SD-ADJ/NOPB" LP3878-ADJ 12.351,82.311 r0 top
U20 "MCP1727T-ADJE/MF" MCP1727T-ADJE/MF 8.274,10.387 r180 top
U21 "LP3878SD-ADJ/NOPB" LP3878-ADJ 9.601,64.338 r90 top
U22 "ADP1741ACPZ-R7" ADP1752_1753/ADP1740_1741 31.439,59.324 r0 top
U23 "ADP1741ACPZ-R7" ADP1752_1753/ADP1740_1741 22.692,61.041 r270 top
U24 "ADP1741ACPZ-R7" ADP1752_1753/ADP1740_1741 58.852,47.828 r180 top
U25 "ADP125ACPZ-R7" ADP124_125 28.575,49.124 r90 top
U26 "LP5900SD-1.8/NOPB" LP5900 43.219,53.819 r180 top
U27 "ADP125ACPZ-R7" ADP124_125 50.038,51.714 r270 top
U28 "ADP125ACPZ-R7" ADP124_125 26.908,53.615 r180 top
U29 "TPS7A3501DRVT" TPS7A3501 35.662,34.417 r270 top
U30 "TPS62163DSGR" TPS62163 15.164,7.175 r180 top
U31 "ADP1753ACPZ-R7" ADP1752_1753/ADP1740_1741 27.457,27.686 r90 top
U32 "TXB0304RSVR" TXB0304 75.082,20.599 r0 top
U33 "TXB0304RSVR" TXB0304 20.084,77.927 r270 top
X1 "VG-4513CA122.8800M-GFCT3" VG-4513CA 73.211,30.896 r180 bottom

## Footprints (in the part's own frame and the unit in brackets; to place one, negate y for a bottom-side part, rotate by r counter-clockwise, add the part's x,y. Pads: shape width x height; smd on the part's side, far side on the other; paste and mask are expansions set on the pad)
AD9690 [mm] "AD9690 9 x 9mm, 64 pin, 0.5 pitch 7.6sq Pad"
  oval 0.6x0.3 smd: 1(-4.4,3.75) 2(-4.4,3.25) 3(-4.4,2.75) 4(-4.4,2.25) 5(-4.4,1.75) 6(-4.4,1.25) 7(-4.4,0.75) 8(-4.4,0.25) 9(-4.4,-0.25) 10(-4.4,-0.75) 11(-4.4,-1.25) 12(-4.4,-1.75) 13(-4.4,-2.25) 14(-4.4,-2.75) 15(-4.4,-3.25) 16(-4.4,-3.75) 33(4.4,-3.75) 34(4.4,-3.25) 35(4.4,-2.75) 36(4.4,-2.25) 37(4.4,-1.75) 38(4.4,-1.25) 39(4.4,-0.75) 40(4.4,-0.25) 41(4.4,0.25) 42(4.4,0.75) 43(4.4,1.25) 44(4.4,1.75) 45(4.4,2.25) 46(4.4,2.75) 47(4.4,3.25) 48(4.4,3.75)
  oval 0.3x0.6 smd: 17(-3.75,-4.4) 18(-3.25,-4.4) 19(-2.75,-4.4) 20(-2.25,-4.4) 21(-1.75,-4.4) 22(-1.25,-4.4) 23(-0.75,-4.4) 24(-0.25,-4.4) 25(0.25,-4.4) 26(0.75,-4.4) 27(1.25,-4.4) 28(1.75,-4.4) 29(2.25,-4.4) 30(2.75,-4.4) 31(3.25,-4.4) 32(3.75,-4.4) 49(3.75,4.4) 50(3.25,4.4) 51(2.75,4.4) 52(2.25,4.4) 53(1.75,4.4) 54(1.25,4.4) 55(0.75,4.4) 56(0.25,4.4) 57(-0.25,4.4) 58(-0.75,4.4) 59(-1.25,4.4) 60(-1.75,4.4) 61(-2.25,4.4) 62(-2.75,4.4) 63(-3.25,4.4) 64(-3.75,4.4)
  rect 7.6x7.6 smd paste-5: 65(0,0)
  rect 1.5x1.5 on Bottom Paste: ""(-2.625,-2.625) ""(-2.625,-0.875) ""(-2.625,0.875) ""(-2.625,2.625) ""(-0.875,-2.625) ""(-0.875,-0.875) ""(-0.875,0.875) ""(-0.875,2.625) ""(0.875,-2.625) ""(0.875,-0.875) ""(0.875,0.875) ""(0.875,2.625) ""(2.625,-2.625) ""(2.625,-0.875) ""(2.625,0.875) ""(2.625,2.625)
  silkscreen extent -5.47,-4.7 4.7,4.7, body extent -4.57,-4.57 4.57,4.57, height 0.8
ADP124_125 [mm] "8-Lead Lead Frame Chip Scale Package [LFCSP_UD]  2 mm × 2 mm Body, Ultra Thin, Dual Lead  (CP-8-10)"
  rect 0.35x0.25 smd: 1(-0.9,0.75) 2(-0.9,0.25) 3(-0.9,-0.25) 4(-0.9,-0.75) 5(0.9,-0.75) 6(0.9,-0.25) 7(0.9,0.25) 8(0.9,0.75)
  rect 1x1.6 smd: 9(0,0)
  silkscreen extent -1.5,-1.2 1.05,1.25, body extent -1.15,-1.05 1.15,1.05, height 0.55
ADP1752_1753/ADP1740_1741 [mm] "16-Lead Lead Frame Chip Scale Package [LFCSP_WQ]  4 mm × 4 mm Body, Very Very Thin Quad  (CP-16-23)"
  rect 0.6x0.3 smd: 1(-1.675,0.975) 2(-1.675,0.325) 3(-1.675,-0.325) 4(-1.675,-0.975) 9(1.675,-0.975) 10(1.675,-0.325) 11(1.675,0.325) 12(1.675,0.975)
  rect 0.3x0.6 smd: 5(-0.975,-1.675) 6(-0.325,-1.675) 7(0.325,-1.675) 8(0.975,-1.675) 13(0.975,1.675) 14(0.325,1.675) 15(-0.325,1.675) 16(-0.975,1.675)
  rect 2.1x2.1 smd: 17(0,0)
  silkscreen extent -2.82,-2.05 2.05,2.05, body extent -2.05,-2.05 2.05,2.05, height 0.8
AP2210K-3.3TRG1 [mm] "SOT23, 5-Leads, Body 2.96x2.83mm, Pitch 0.95mm, IPC High Density"
  rect 1x0.7 smd: 1(-1.3,0.95) 2(-1.3,0) 3(-1.3,-0.95) 4(1.3,-0.95) 5(1.3,0.95)
  silkscreen extent -1.43,-1.55 0.45,1.97, body extent -1.5,-1.55 1.5,1.55, height 1.45
AT24CM02 [mm]
  rect 1.55x0.6 smd: 1(-2.7,1.905) 2(-2.7,0.635) 3(-2.7,-0.635) 4(-2.7,-1.905) 5(2.7,-1.905) 6(2.7,-0.635) 7(2.7,0.635) 8(2.7,1.905)
  silkscreen extent -2.82,-2.2 1.92,2.88, body extent -3,-2.45 3,2.45, height 1.75
"CAP 0201/0603 RF" [mm] "Chip Capacitor, 2-Leads, Body 0.60x0.30mm, IPC High Density"
  rect 0.3x0.32 smd: 1(-0.26,0) 2(0.26,0)
  silkscreen extent -0.58,-0.33 0.58,0.33, body extent -0.3,-0.15 0.3,0.15, height 0.3
"CAP 0402/1005 RF" [mm] "Chip Capacitor, 2-Leads, Body 1.02x0.51mm, IPC High Density"
  rect 0.55x0.54 smd: 1(-0.39,0) 2(0.39,0)
  silkscreen extent -0.87,-0.45 0.87,0.45, body extent -0.5,-0.26 0.5,0.26, height 0.52
"CAP 0603/1608 RF" [mm] "Chip Capacitor, 2-Leads, Body 1.60x0.80mm, IPC High Density"
  rect 0.8x0.9 smd: 1(-0.625,0) 2(0.625,0)
  silkscreen extent -1.2,-0.63 1.2,0.63, body extent -0.8,-0.41 0.8,0.41, height 0.82
"CAP 0805/2012 RF" [mm] "Chip Capacitor, 2-Leads, Body 2.00x1.20mm, IPC High Density"
  rect 1.1x1.3 smd: 1(-0.7,0) 2(0.7,0)
  silkscreen extent -1.43,-0.82 1.43,0.82, body extent -1,-0.64 1,0.64, height 1.26
"CASE 457" [mil] "CASE 457-04, MBRM140T1G"
  rect 105.12x100 smd: 1(-65.06,0)
  rect 30x50 smd: 2(27.5,0)
  silkscreen extent -126,-61 -122,-57, body extent -118,-52 27,53, height 43
CDRH5D28 [mm] "CDRH5D28 , Precision Wire Wound Inductor, 2-Leads, Body 6,00x6,00mm, IPC High Density"
  rect 2.15x6.3 smd: 1(-2.075,0) 2(2.075,0)
  silkscreen extent -0.45,-3 0.45,3, body extent -3.1,-3.15 3.1,3.15, height 3.1
FB0603 [mm] "Chip Inductor, 2-Leads, Body 1,60x0,80mm, IPC High Density"
  rect 0.6x0.85 smd: 1(-0.7,0) 2(0.7,0)
  silkscreen extent -0.05,-0.3 0.05,0.3, body extent -0.8,-0.4 0.8,0.4, height 0.8
FCSL110R005FERCT-ND [mm] "Wide 4320 (11050 Metric), 2043"
  rect 1.05x11.2 smd: 1(-2.3,0) 2(2.3,0)
  silkscreen extent -1.4,-5.5 1.4,5.5, body extent -2.8,-5.6 2.8,5.6, height 0.8
"FER 0402/1005" [mm] "Chip Ferrite, 2-Leads, Body 1.02x0.51mm, IPC Medium Density"
  rect 0.6x0.64 smd: 1(-0.44,0) 2(0.44,0)
  silkscreen extent -1,-0.5 1,0.5, body extent -0.5,-0.26 0.5,0.26, height 0.52
"FER 0603/1608" [mm] "Chip Ferrite, 2-Leads, Body 1.60x0.80mm, IPC Medium Density"
  rect 0.9x1 smd: 1(-0.675,0) 2(0.675,0)
  silkscreen extent -1.4,-0.7 1.4,0.7, body extent -0.8,-0.41 0.8,0.41, height 0.82
FIDUCIALS [mm]
  round 1 smd paste-10 mask+0.5: 0(0,0)
  round 1 smd far side paste-10 mask+0.5: 0(0,0)
  KeepOutLayer circle w0.01: c0,0 r1
GPS05605 [mm] "SOT343, 4-Leads, Body 2,00x2,15mm, Pitch 1,30mm, IPC High Density"
  rect 0.5x0.35 smd: 1(-1.05,0.65) 3(1.05,-0.65) 4(1.05,0.65)
  rect 0.5x0.65 smd: 2(-1.05,-0.5)
  silkscreen extent -1.1,-1 0.65,1.17, body extent -1.22,-1 1.23,1, height 0.9
HMC472ALP4E [mm] "24-VFQFN Exposed Pad"
  rect 0.35x0.25 smd: 1(-1.825,1.25) 2(-1.825,0.75) 3(-1.825,0.25) 4(-1.825,-0.25) 5(-1.825,-0.75) 6(-1.825,-1.25) 13(1.825,-1.25) 14(1.825,-0.75) 15(1.825,-0.25) 16(1.825,0.25) 17(1.825,0.75) 18(1.825,1.25)
  rect 0.25x0.35 smd: 7(-1.25,-1.825) 8(-0.75,-1.825) 9(-0.25,-1.825) 10(0.25,-1.825) 11(0.75,-1.825) 12(1.25,-1.825) 19(1.25,1.825) 20(0.75,1.825) 21(0.25,1.825) 22(-0.25,1.825) 23(-0.75,1.825) 24(-1.25,1.825)
  rect 2.8x2.8 smd: 25(0,0)
  silkscreen extent -2.82,-2.05 2.05,2.05, body extent -2.05,-2.05 2.05,2.05, height 0.39
INA226 [mm] "TSSOP, 10-Leads, Body 3,00x3,00mm, Pitch 0,50mm, IPC Medium Density"
  rect 1.45x0.3 smd: 1(-2.2,1) 2(-2.2,0.5) 3(-2.2,0) 4(-2.2,-0.5) 5(-2.2,-1) 6(2.2,-1) 7(2.2,-0.5) 8(2.2,0) 9(2.2,0.5) 10(2.2,1)
  silkscreen extent -2.32,-1.55 1.15,1.83, body extent -2.45,-1.55 2.45,1.55, height 1.1
"IND 0402/1005 RF WW" [mm] "Chip Inductor, 2-Leads, Body 1.00x0.50mm, IPC High Density"
  rect 0.48x0.54 smd: 1(-0.44,0) 2(0.44,0)
  silkscreen extent -0.87,-0.45 0.87,0.45, body extent -0.5,-0.29 0.5,0.29, height 0.51
"LED 0603/1608 GREEN" [mm] "Chip Diode, 2-Leads, Body 1.60x0.80mm, IPC Medium Density"
  rect 0.8x0.8 smd: 1(-0.75,0) 2(0.75,0)
  silkscreen extent -1.52,-0.7 1.52,0.7, body extent -0.8,-0.4 0.8,0.4, height 0.53
LMK04610 [mm] "PQFN, 56-Leads, Body 8,00x8,00mm, Pitch 0,50mm, Thermal Pad 5,70x5,70mm, IPC High Density"
  rect 0.6x0.24 smd: 1(-3.9,3.25) 2(-3.9,2.75) 3(-3.9,2.25) 4(-3.9,1.75) 5(-3.9,1.25) 6(-3.9,0.75) 7(-3.9,0.25) 8(-3.9,-0.25) 9(-3.9,-0.75) 10(-3.9,-1.25) 11(-3.9,-1.75) 12(-3.9,-2.25) 13(-3.9,-2.75) 14(-3.9,-3.25) 29(3.9,-3.25) 30(3.9,-2.75) 31(3.9,-2.25) 32(3.9,-1.75) 33(3.9,-1.25) 34(3.9,-0.75) 35(3.9,-0.25) 36(3.9,0.25) 37(3.9,0.75) 38(3.9,1.25) 39(3.9,1.75) 40(3.9,2.25) 41(3.9,2.75) 42(3.9,3.25)
  rect 0.24x0.6 smd: 15(-3.25,-3.9) 16(-2.75,-3.9) 17(-2.25,-3.9) 18(-1.75,-3.9) 19(-1.25,-3.9) 20(-0.75,-3.9) 21(-0.25,-3.9) 22(0.25,-3.9) 23(0.75,-3.9) 24(1.25,-3.9) 25(1.75,-3.9) 26(2.25,-3.9) 27(2.75,-3.9) 28(3.25,-3.9) 43(3.25,3.9) 44(2.75,3.9) 45(2.25,3.9) 46(1.75,3.9) 47(1.25,3.9) 48(0.75,3.9) 49(0.25,3.9) 50(-0.25,3.9) 51(-0.75,3.9) 52(-1.25,3.9) 53(-1.75,3.9) 54(-2.25,3.9) 55(-2.75,3.9) 56(-3.25,3.9)
  rect 5.7x5.7 smd paste-2.85 mask+0.102: 57(0,0)
  rect 1.15x1.15 on Bottom Paste: ""(-2.025,-2.025) ""(-2.025,-0.675) ""(-2.025,0.675) ""(-2.025,2.025) ""(-0.675,-2.025) ""(-0.675,-0.675) ""(-0.675,0.675) ""(-0.675,2.025) ""(0.675,-2.025) ""(0.675,-0.675) ""(0.675,0.675) ""(0.675,2.025) ""(2.025,-2.025) ""(2.025,-0.675) ""(2.025,0.675) ""(2.025,2.025)
  silkscreen extent -4.85,-4.08 4.08,4.08, body extent -4.07,-4.08 4.08,4.07, height 1
LP3878-ADJ [mm] "SDC08A"
  rect 0.6x0.3 smd: 1(-1.9,1.2) 2(-1.9,0.4) 3(-1.9,-0.4) 4(-1.9,-1.2) 5(1.9,-1.2) 6(1.9,-0.4) 7(1.9,0.4) 8(1.9,1.2)
  rect 2.6x3 smd: 9(0,0)
  silkscreen extent -2.6,-2.15 2.15,2.2, body extent -2,-2 2,2, height 0.8
LP5900 [mm] "PSON, 6-Leads, Body 2.10x2.50mm, Pitch 0.65mm, Thermal Pad 1.20x0.75mm, IPC High Density"
  rect 0.6x0.25 smd: 1(-1.15,0.65) 2(-1.15,0) 3(-1.15,-0.65) 4(1.15,-0.65) 5(1.15,0) 6(1.15,0.65)
  rect 0.75x1.2 smd: 7(0,0)
  silkscreen extent -1.85,-1.2 1.4,1.25, body extent -1.25,-1.05 1.25,1.05, height 0.8
LT3504 [mm] "UFD Package  28-Lead Plastic QFN (4mm × 5mm)  (Reference LTC DWG # 05-08-1712 Rev B)"
  rect 0.7x0.25 smd: 1(-1.9,1.75) 2(-1.9,1.25) 3(-1.9,0.75) 4(-1.9,0.25) 5(-1.9,-0.25) 6(-1.9,-0.75) 7(-1.9,-1.25) 8(-1.9,-1.75) 15(1.9,-1.75) 16(1.9,-1.25) 17(1.9,-0.75) 18(1.9,-0.25) 19(1.9,0.25) 20(1.9,0.75) 21(1.9,1.25) 22(1.9,1.75)
  rect 0.25x0.7 smd: 9(-1.25,-2.4) 10(-0.75,-2.4) 11(-0.25,-2.4) 12(0.25,-2.4) 13(0.75,-2.4) 14(1.25,-2.4) 23(1.25,2.4) 24(0.75,2.4) 25(0.25,2.4) 26(-0.25,2.4) 27(-0.75,2.4) 28(-1.25,2.4)
  rect 2.65x3.65 smd: 29(0,0)
  silkscreen extent -2.82,-2.55 2.05,2.55, body extent -2.05,-2.55 2.05,2.55, height 0.8
MABA-007681-CT2010 [mm] "MABA-007681-CT2010"
  rect 2.4x1.27 smd: 1(-2.725,2.54) 2(-2.725,-2.54) 3(2.725,-2.54) 4(2.725,2.54)
  silkscreen extent -2.92,-3.33 2.44,3.48, body extent -3.17,-3.55 3.18,3.55, height 1.85
MABAES0060 [mm] "SOTFL, 5-Leads, Body 3.81x2.81mm, Pitch 1.27mm, IPC High Density"
  rect 1.4x0.76 smd: 1(-1.715,1.27) 2(-1.715,0) 3(-1.715,-1.27) 4(1.715,-1.27) 5(1.715,1.27)
  silkscreen extent -1.84,-1.9 1.4,2.32, body extent -1.4,-1.9 1.41,1.9, height 2.8
MADP-011029-14150 [mm] "PSON, 6-Leads, Body 1,20x1,50mm, Pitch 0,40mm, Thermal Pad 0,85x0,47mm, IPC High Density"
  rect 0.34x0.25 smd: 1(-0.6,0.4) 2(-0.6,0) 3(-0.6,-0.4) 4(0.6,-0.4) 5(0.6,0) 6(0.6,0.4)
  rect 0.47x0.85 smd: 7(0,0)
  silkscreen extent -1.03,0.69 -0.93,0.79, body extent -0.75,-0.6 0.75,0.6, height 0.8
MCP1727T-ADJE/MF [mm] "SON, 8-Leads, Body 3.00x3.00mm, Pitch 0.65mm, Thermal Pad 2.40x1.60mm, IPC High Density"
  rect 0.6x0.35 smd: 1(-1.3,0.975) 2(-1.3,0.325) 3(-1.3,-0.325) 4(-1.3,-0.975) 5(1.3,-0.975) 6(1.3,-0.325) 7(1.3,0.325) 8(1.3,0.975)
  rect 1.6x2.4 smd: 9(0,0)
  silkscreen extent -2.1,-1.65 1.65,1.7, body extent -1.5,-1.5 1.5,1.5, height 1